# Altium PCB OpenRex_V1I1_PCB.PcbDoc (part 1 of 12)
Units mm, origin at the board's own origin, x right, y up, seen from the top; angles counter-clockwise.
Board outline 70 x 95 mm, 10 copper layers (L1, L2, L3, L4 (PWR), L5 (PWR), L6 (PWR), L7 (PWR), L8, L9, L10), stack 1.632 mm thick; 1080 components, 708 nets, 3831 pads, 2373 vias.
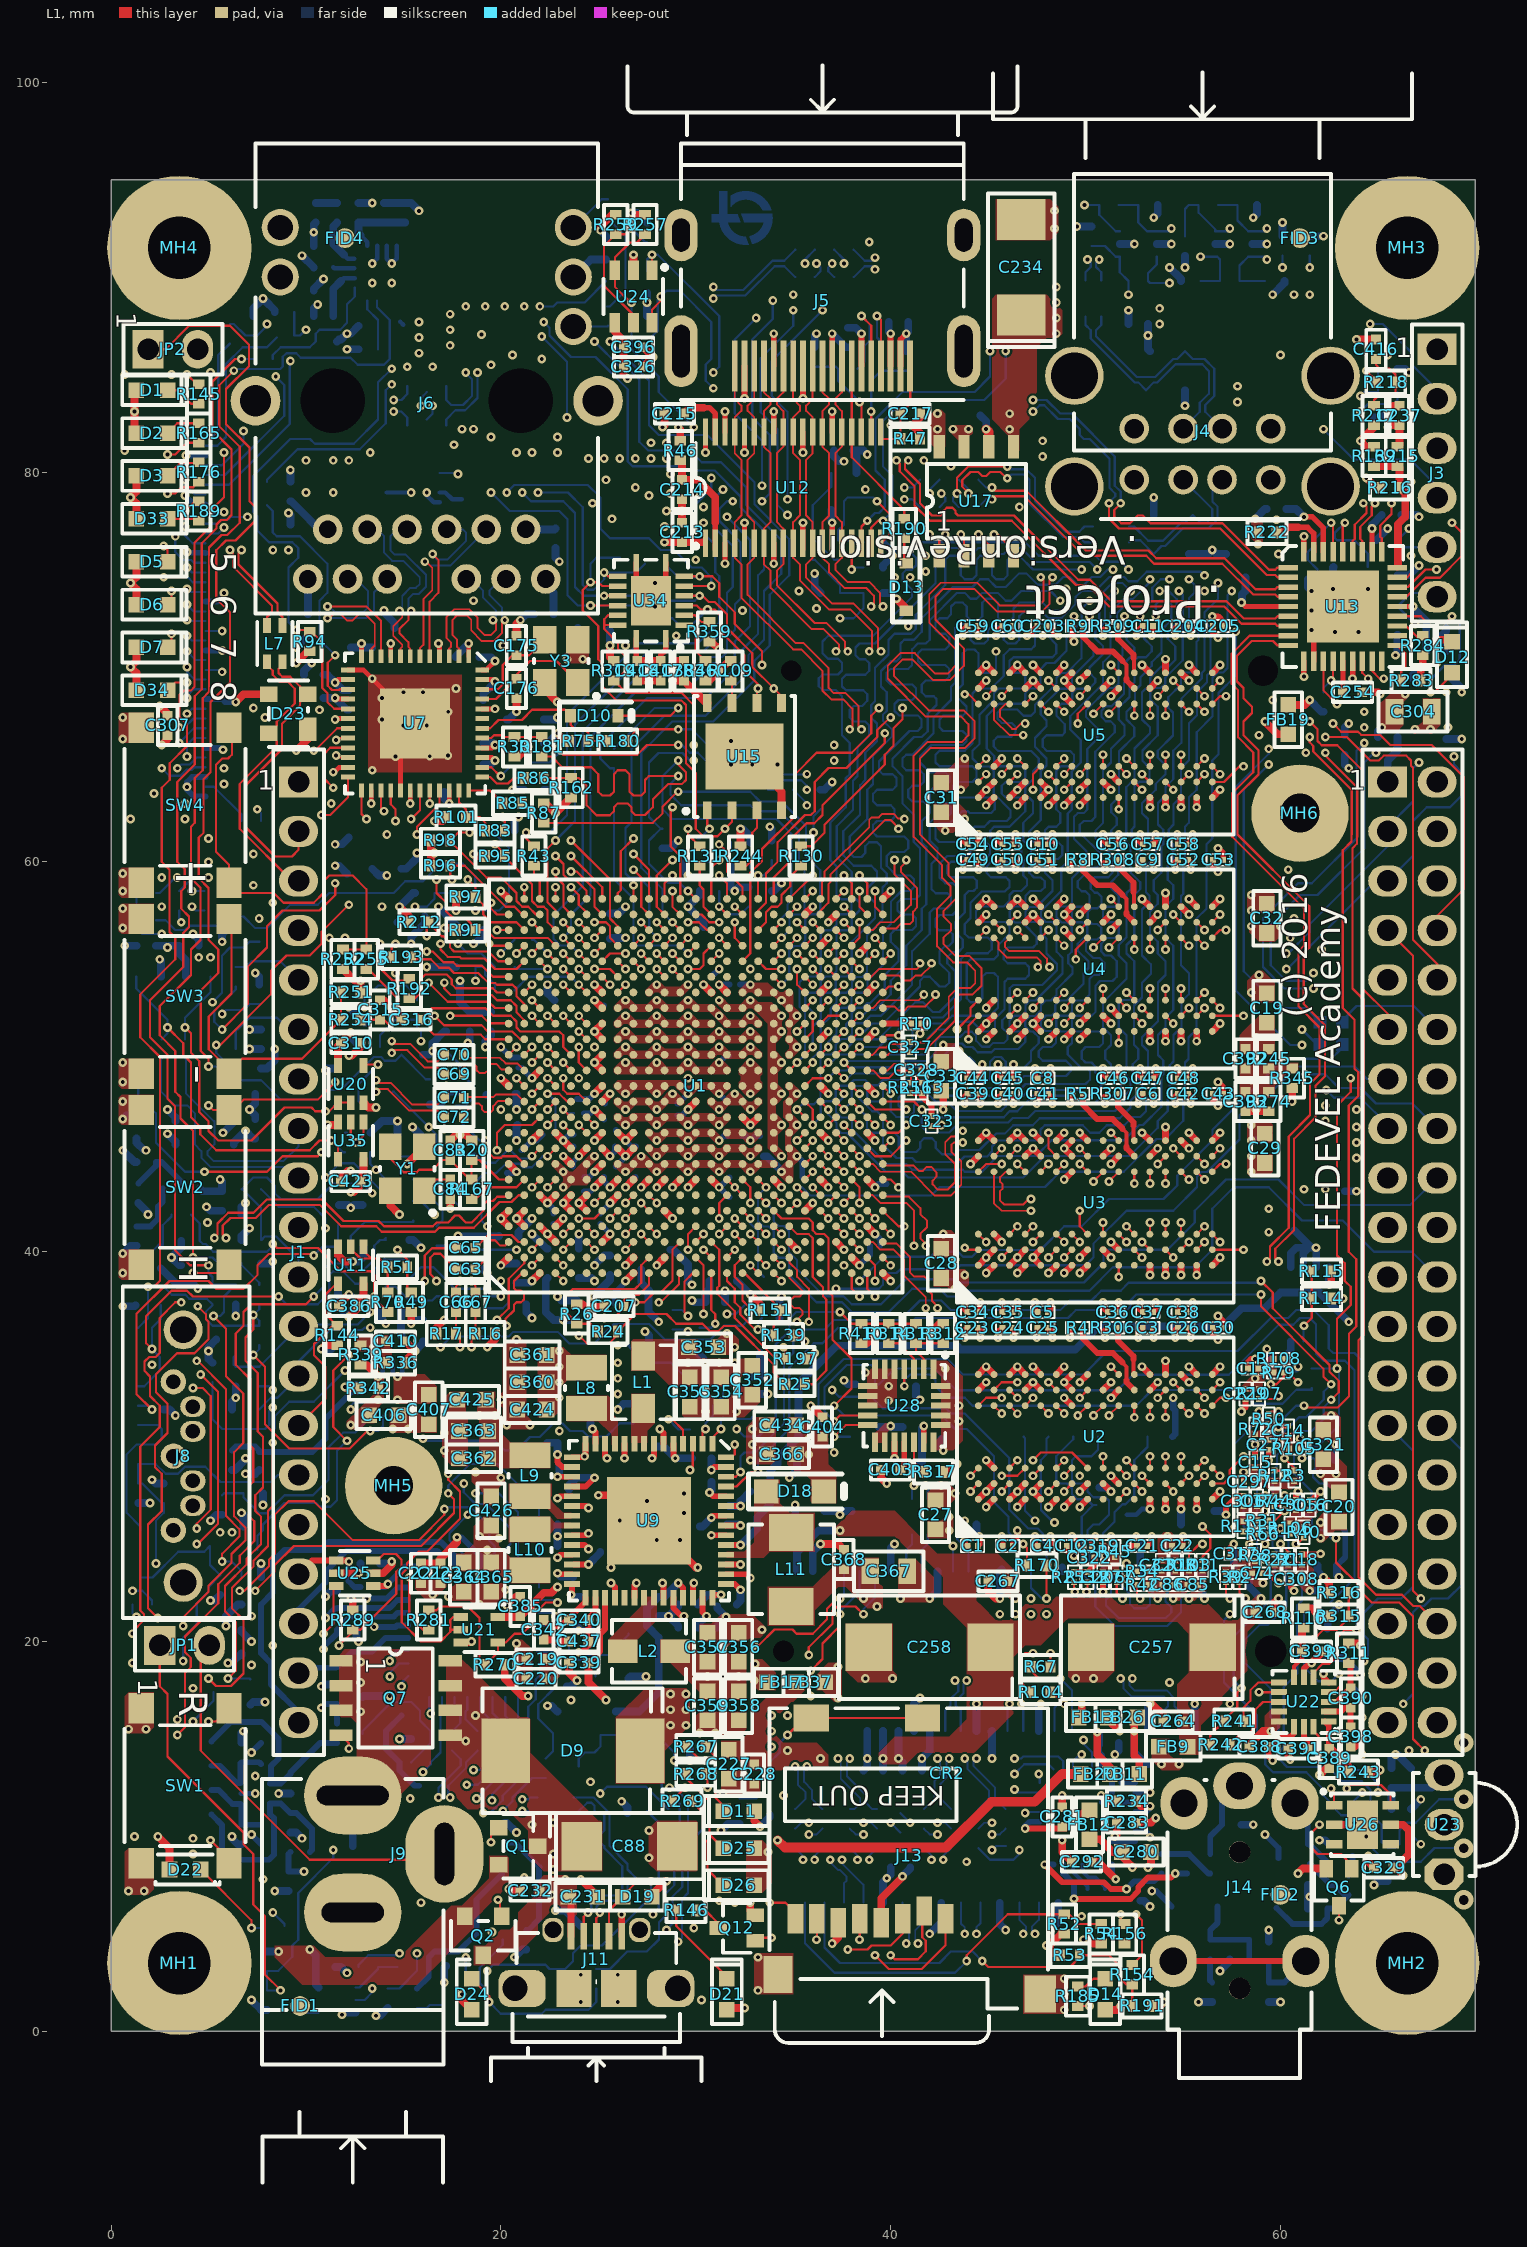
[diagram p0: L1 view]
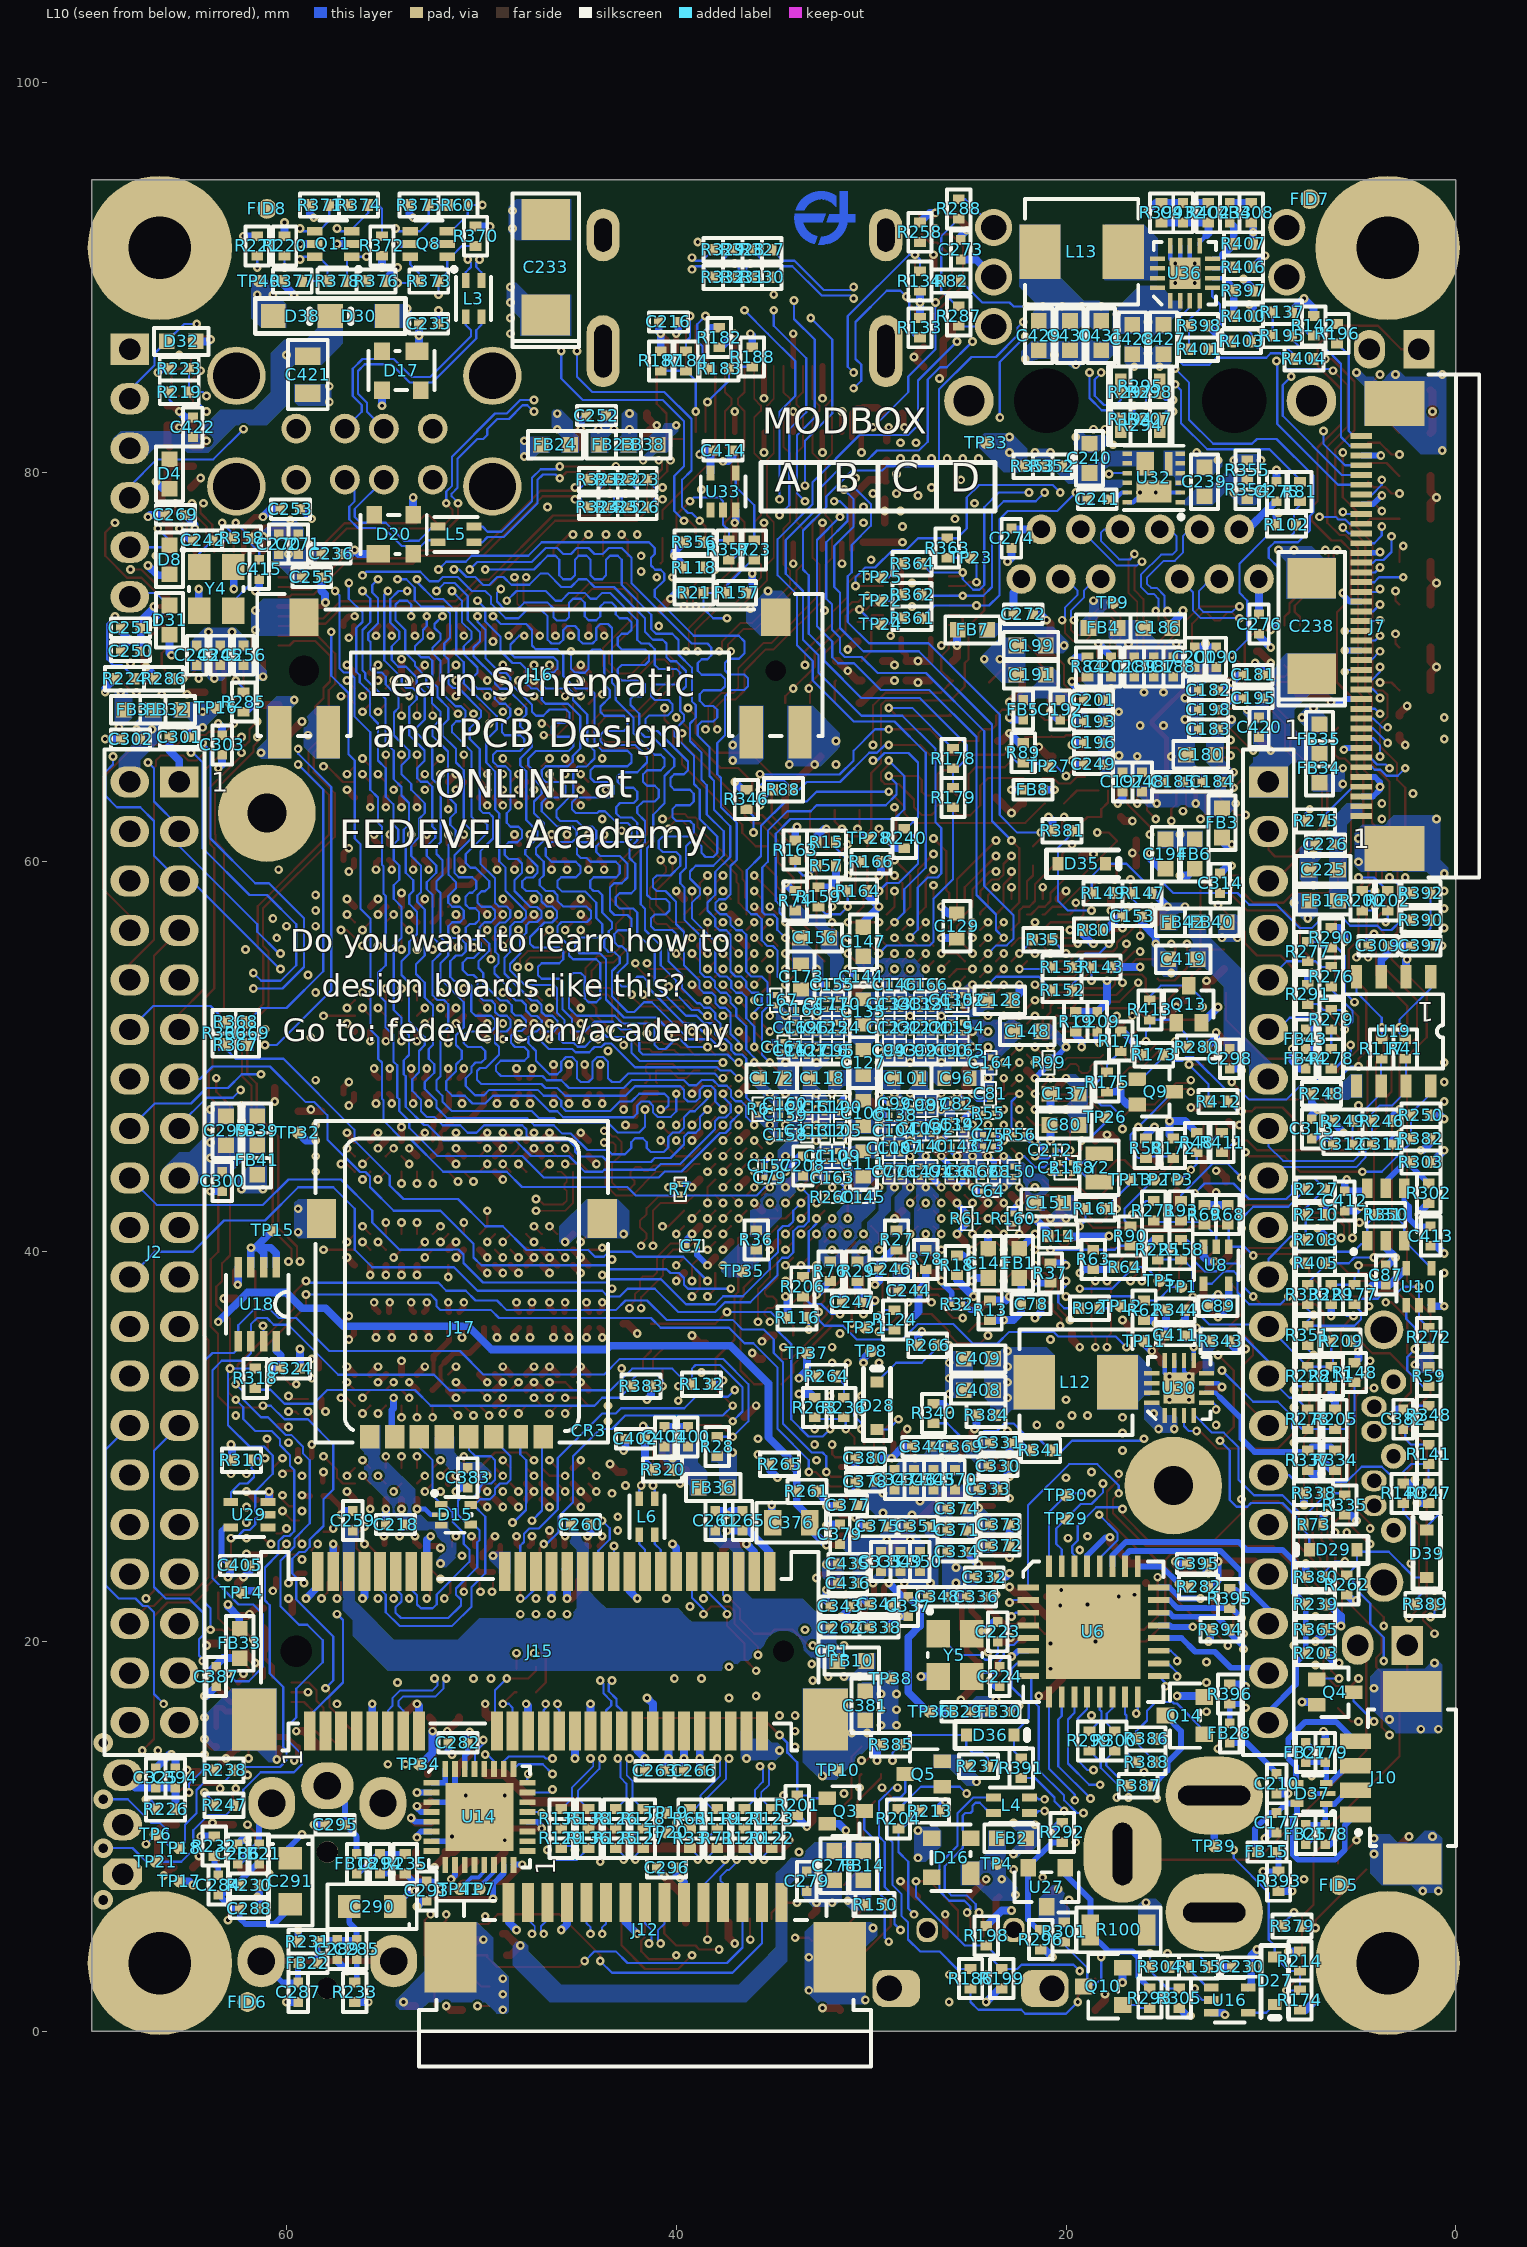
[diagram p1: L10 view, seen from below]
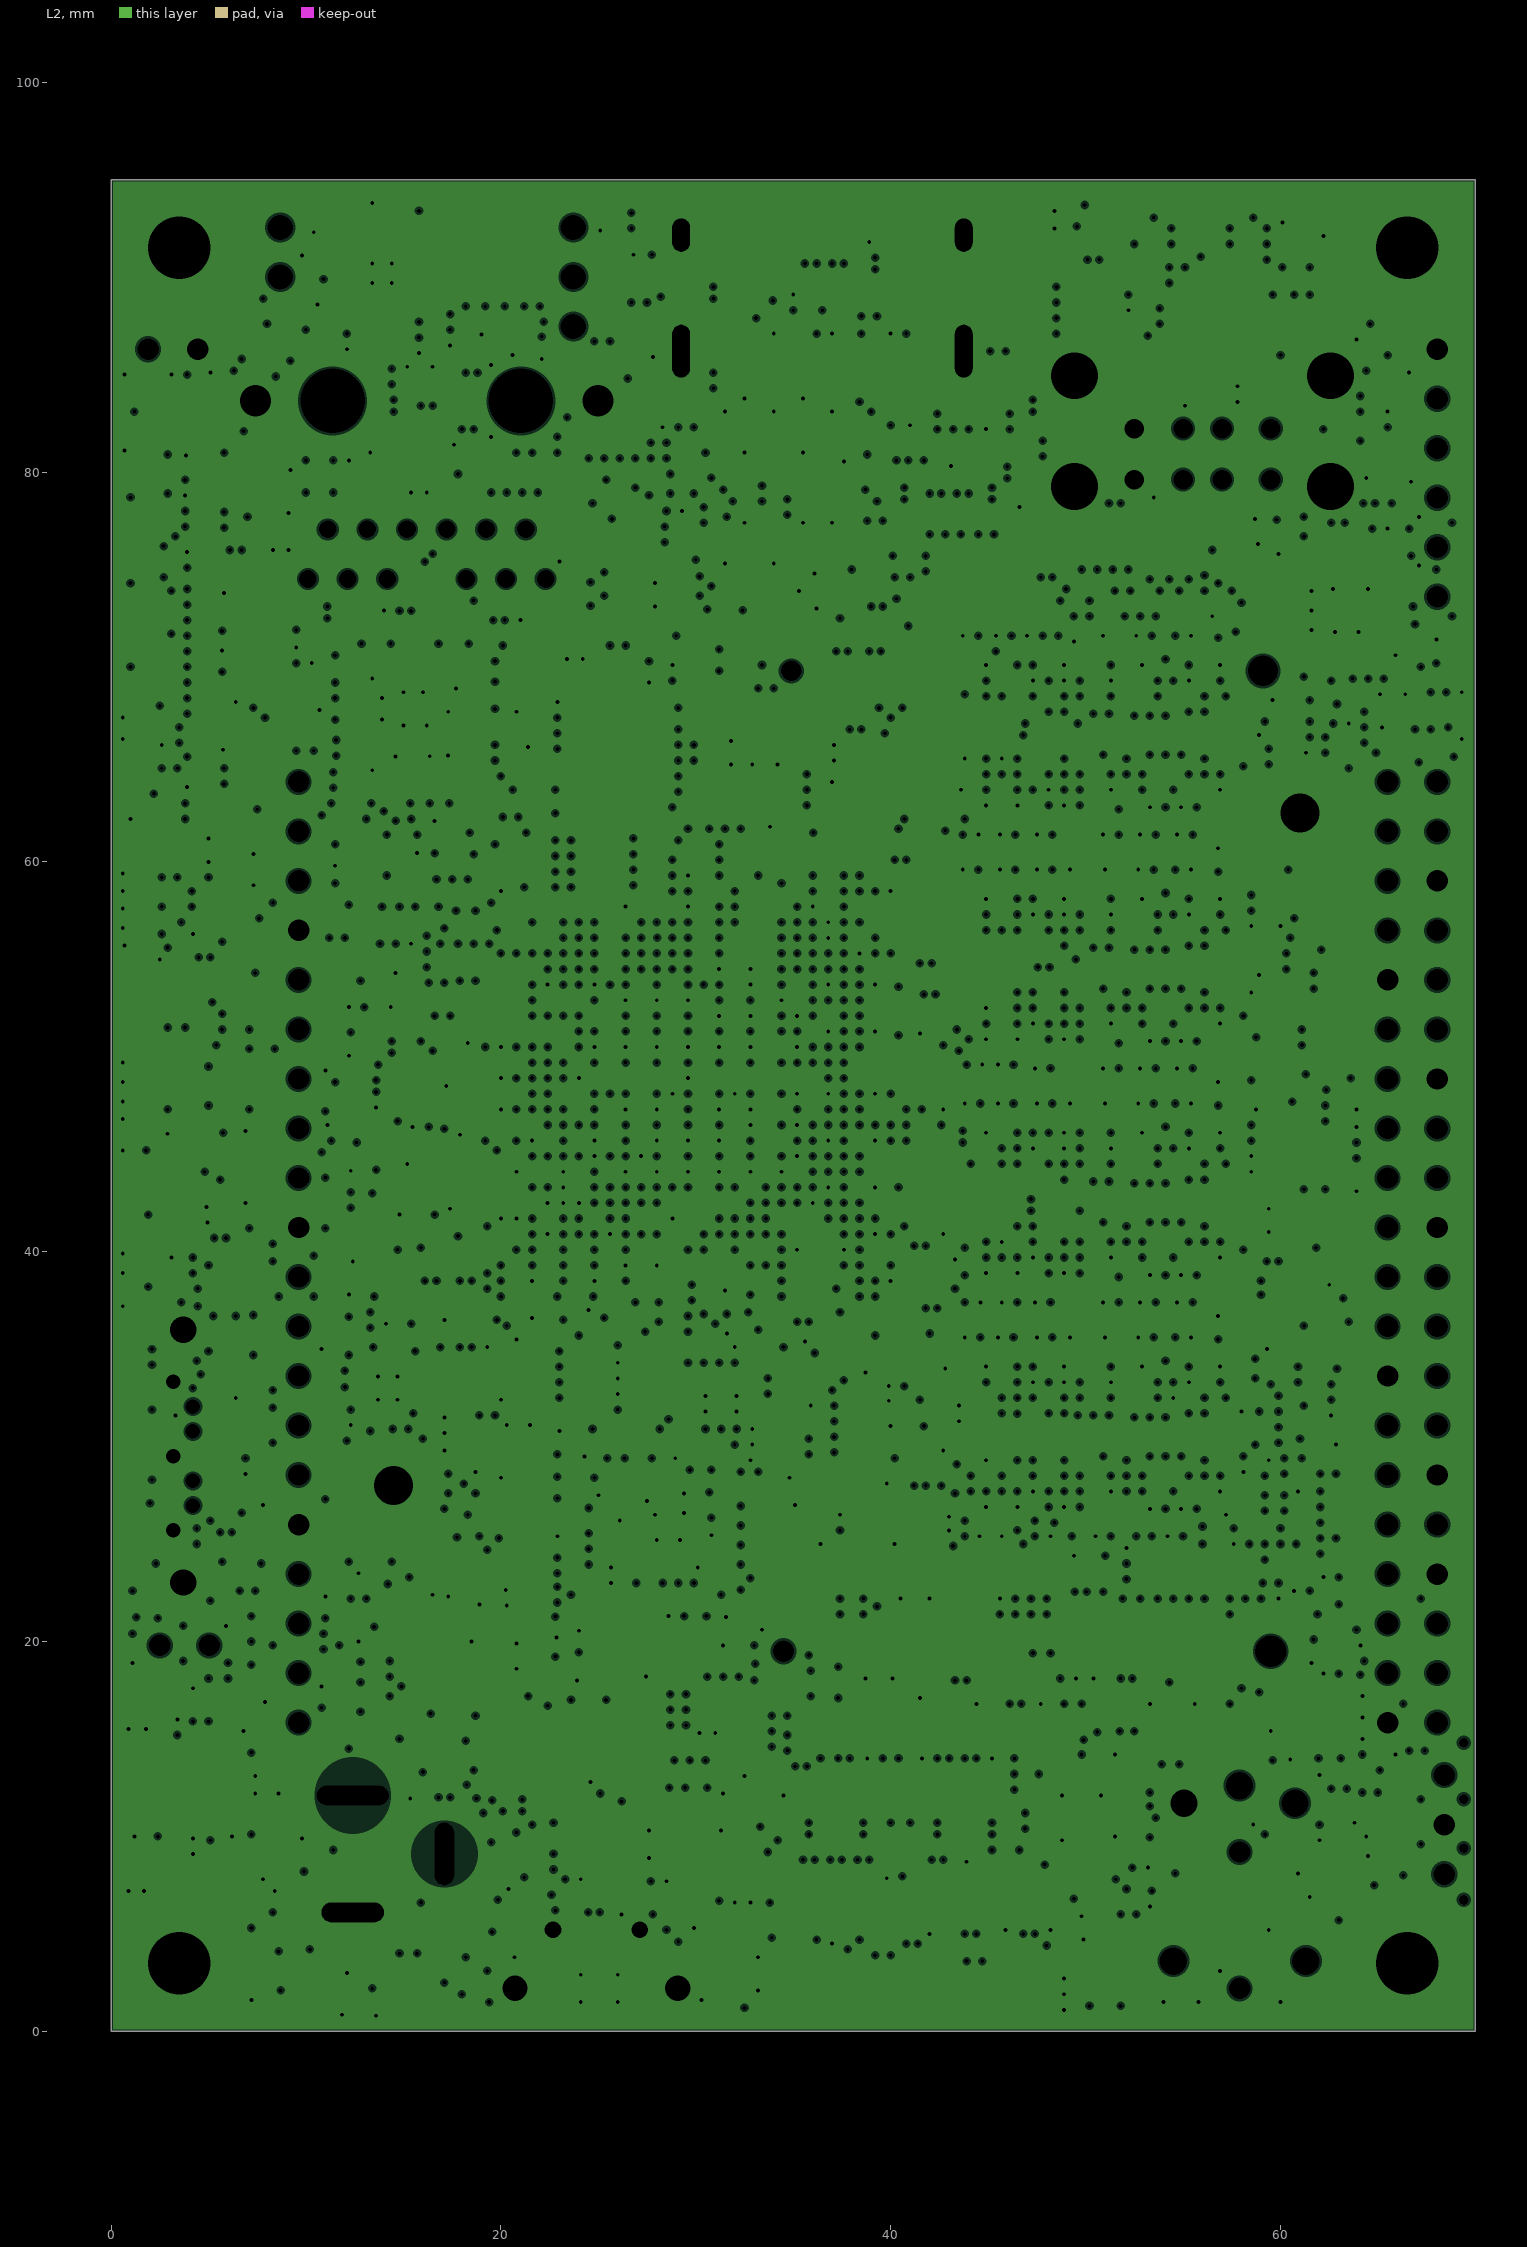
[diagram p2: L2, clearances drawn from the general rule]
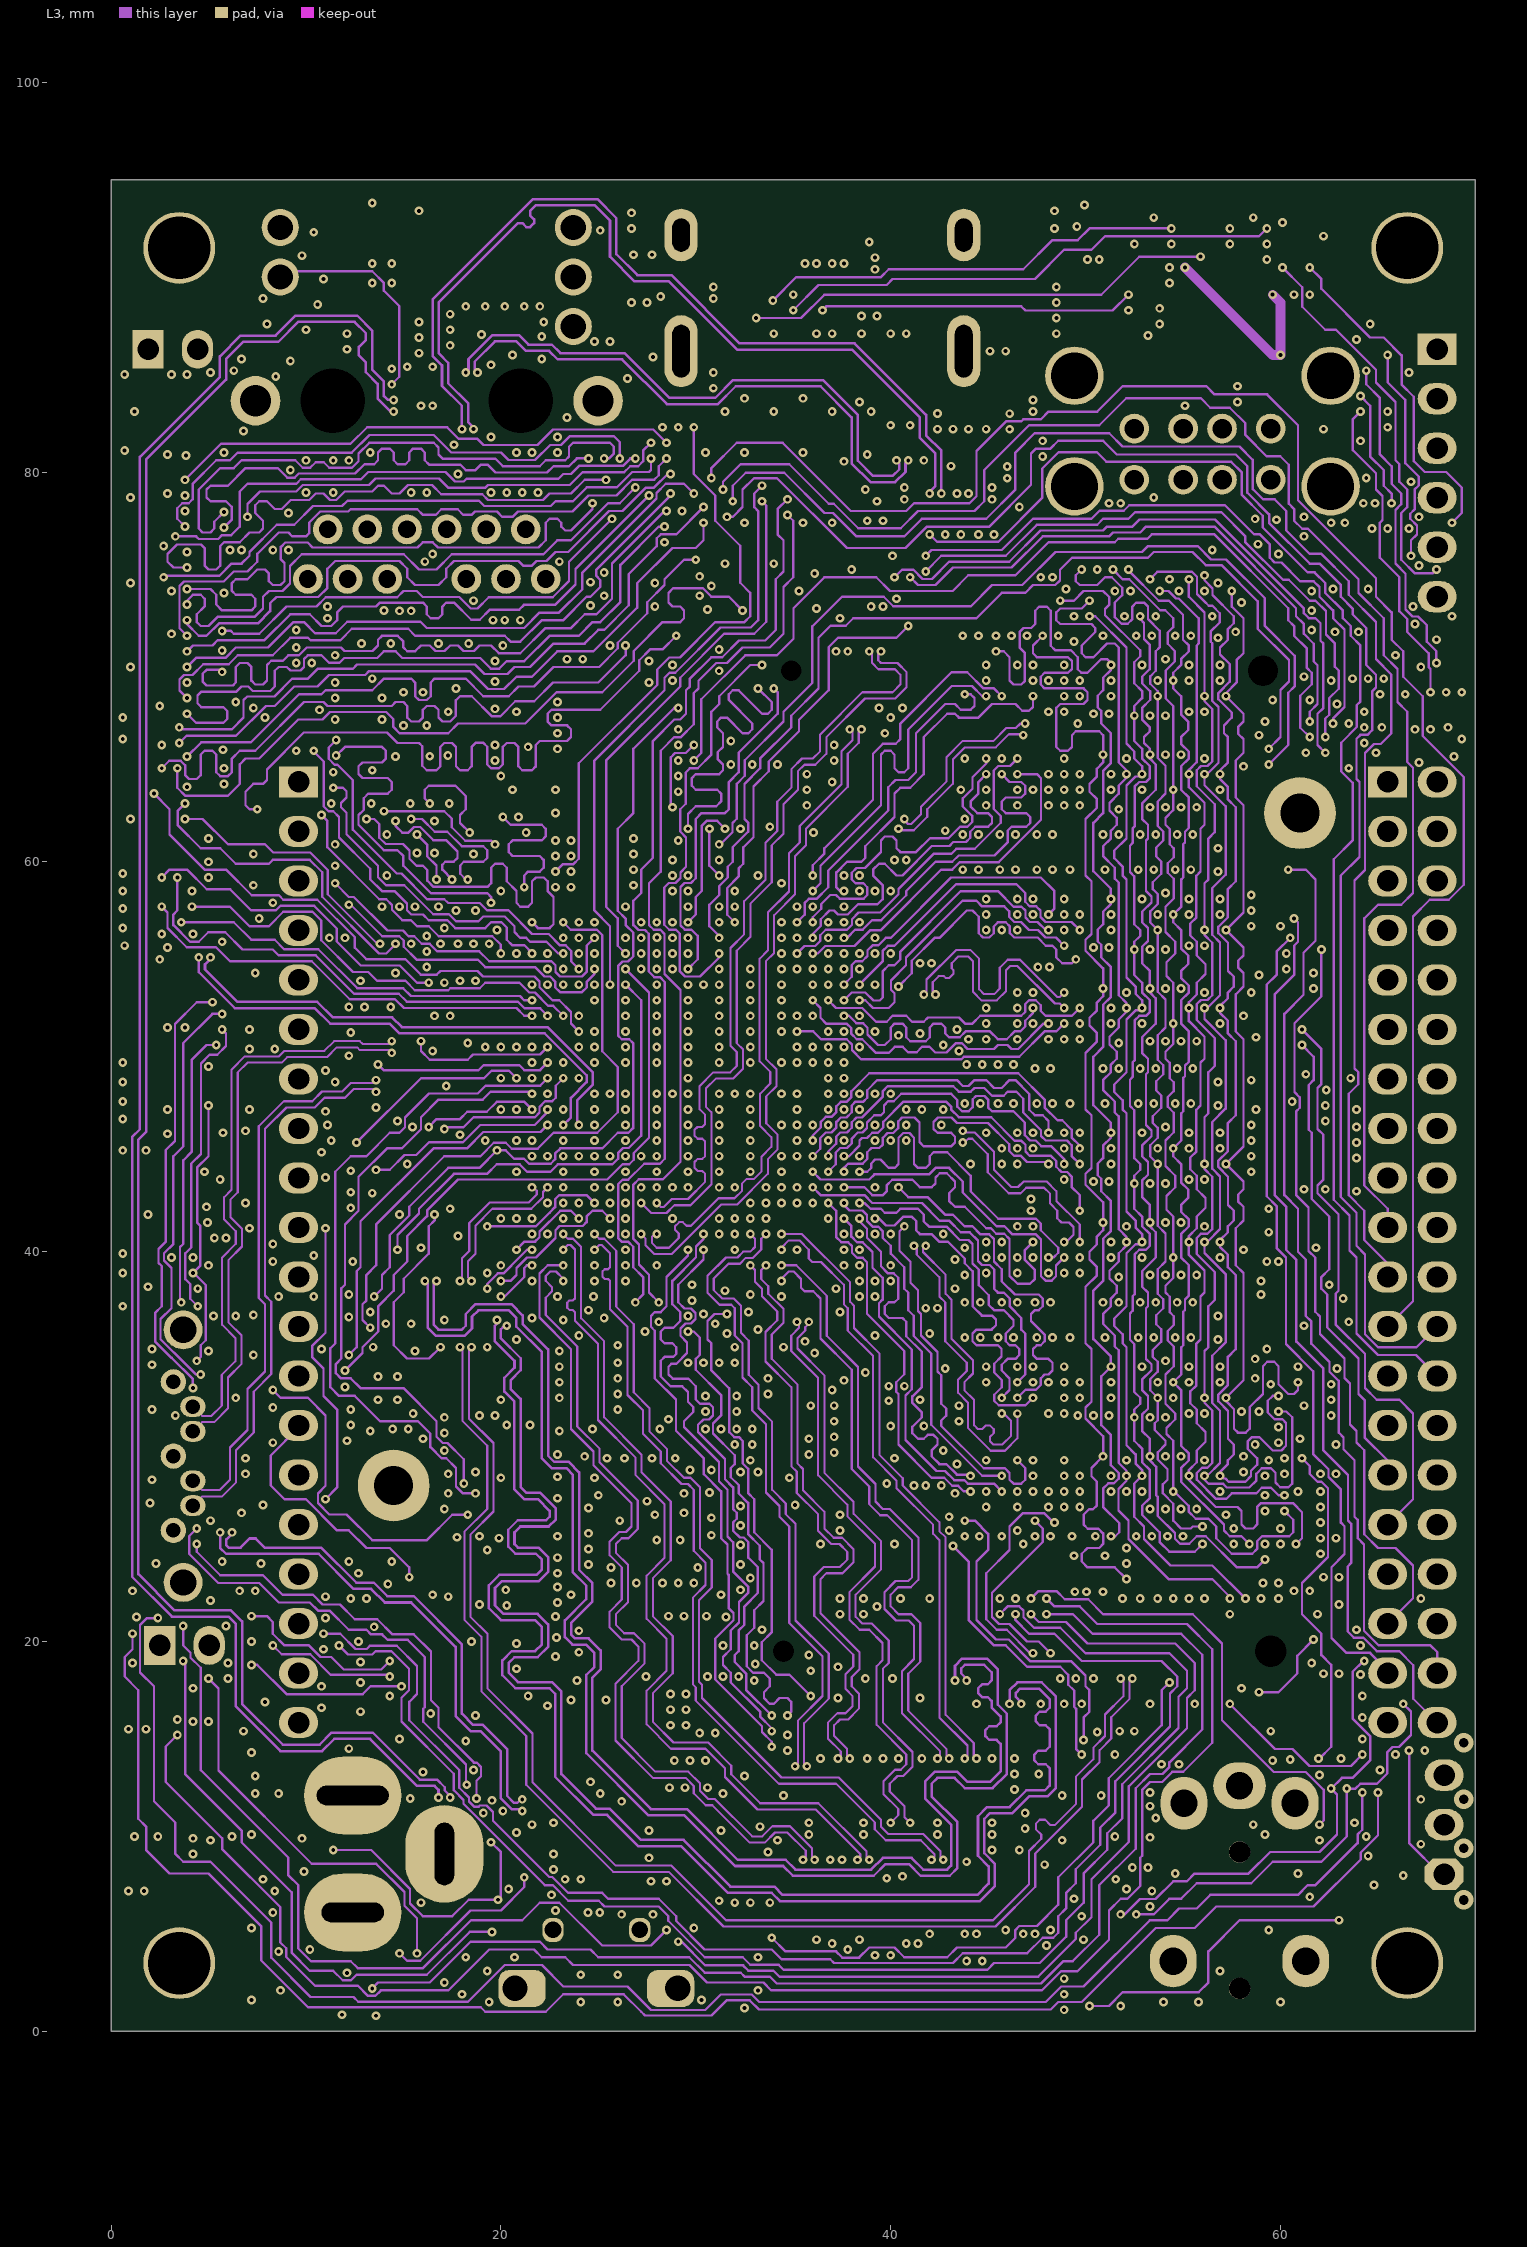
[diagram p3: L3]
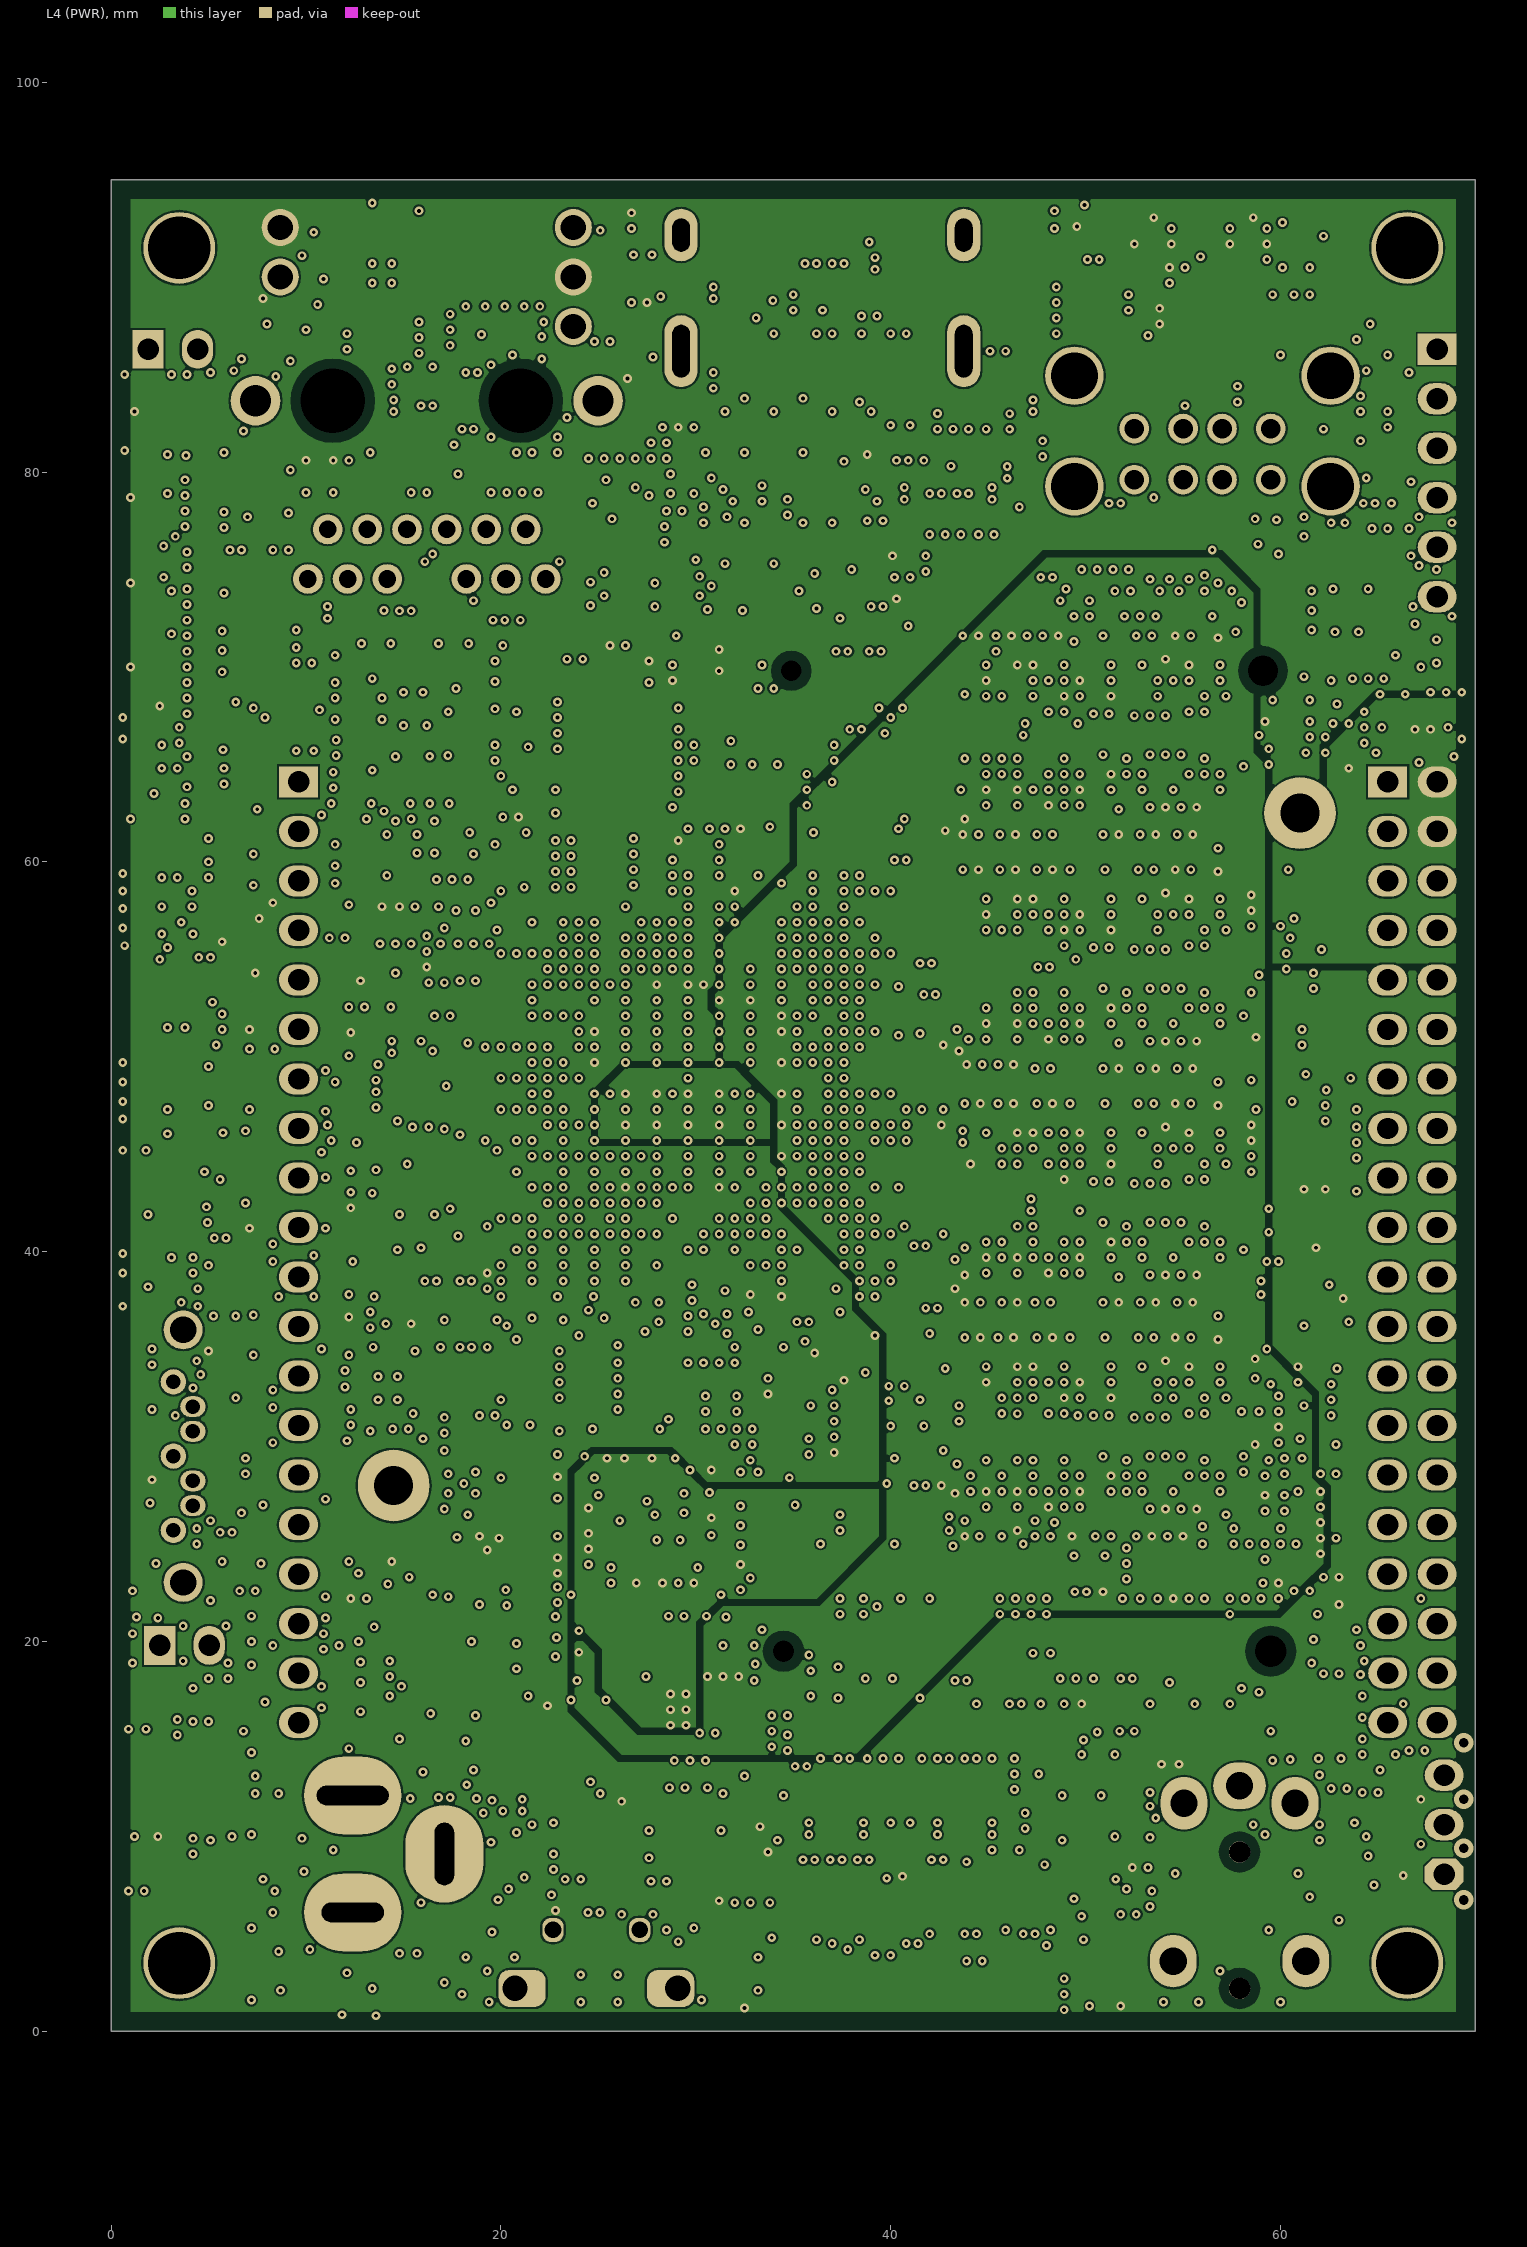
[diagram p4: L4 (PWR)]
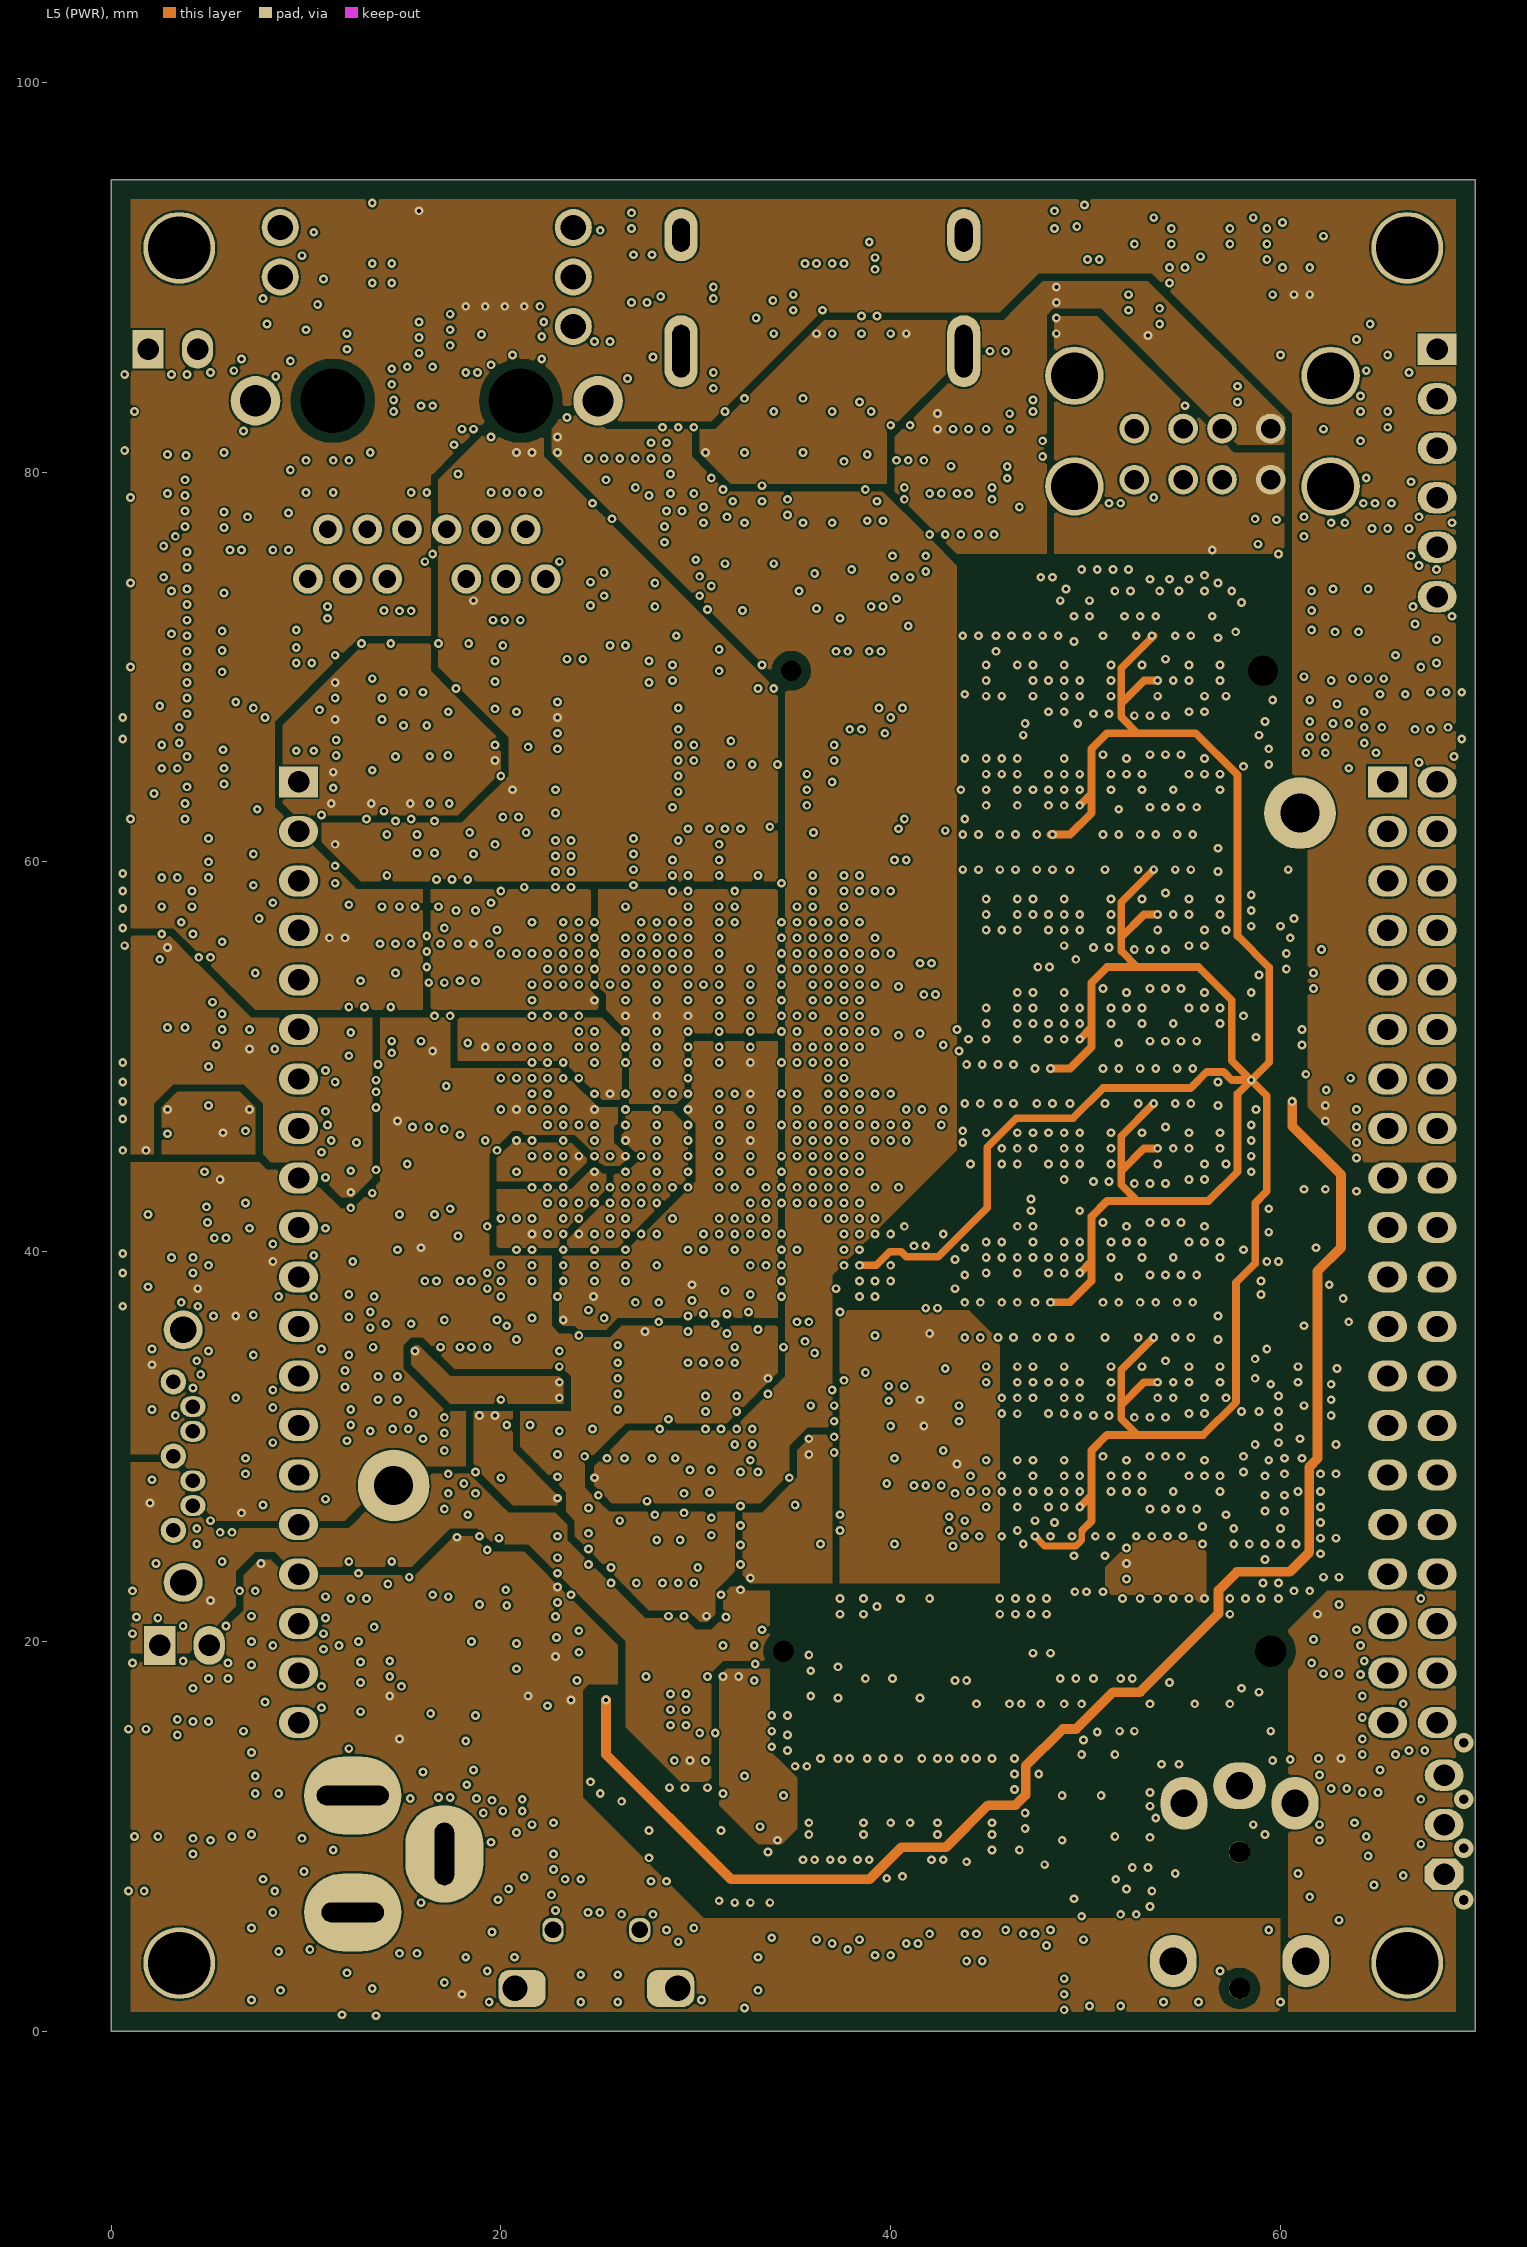
[diagram p5: L5 (PWR)]
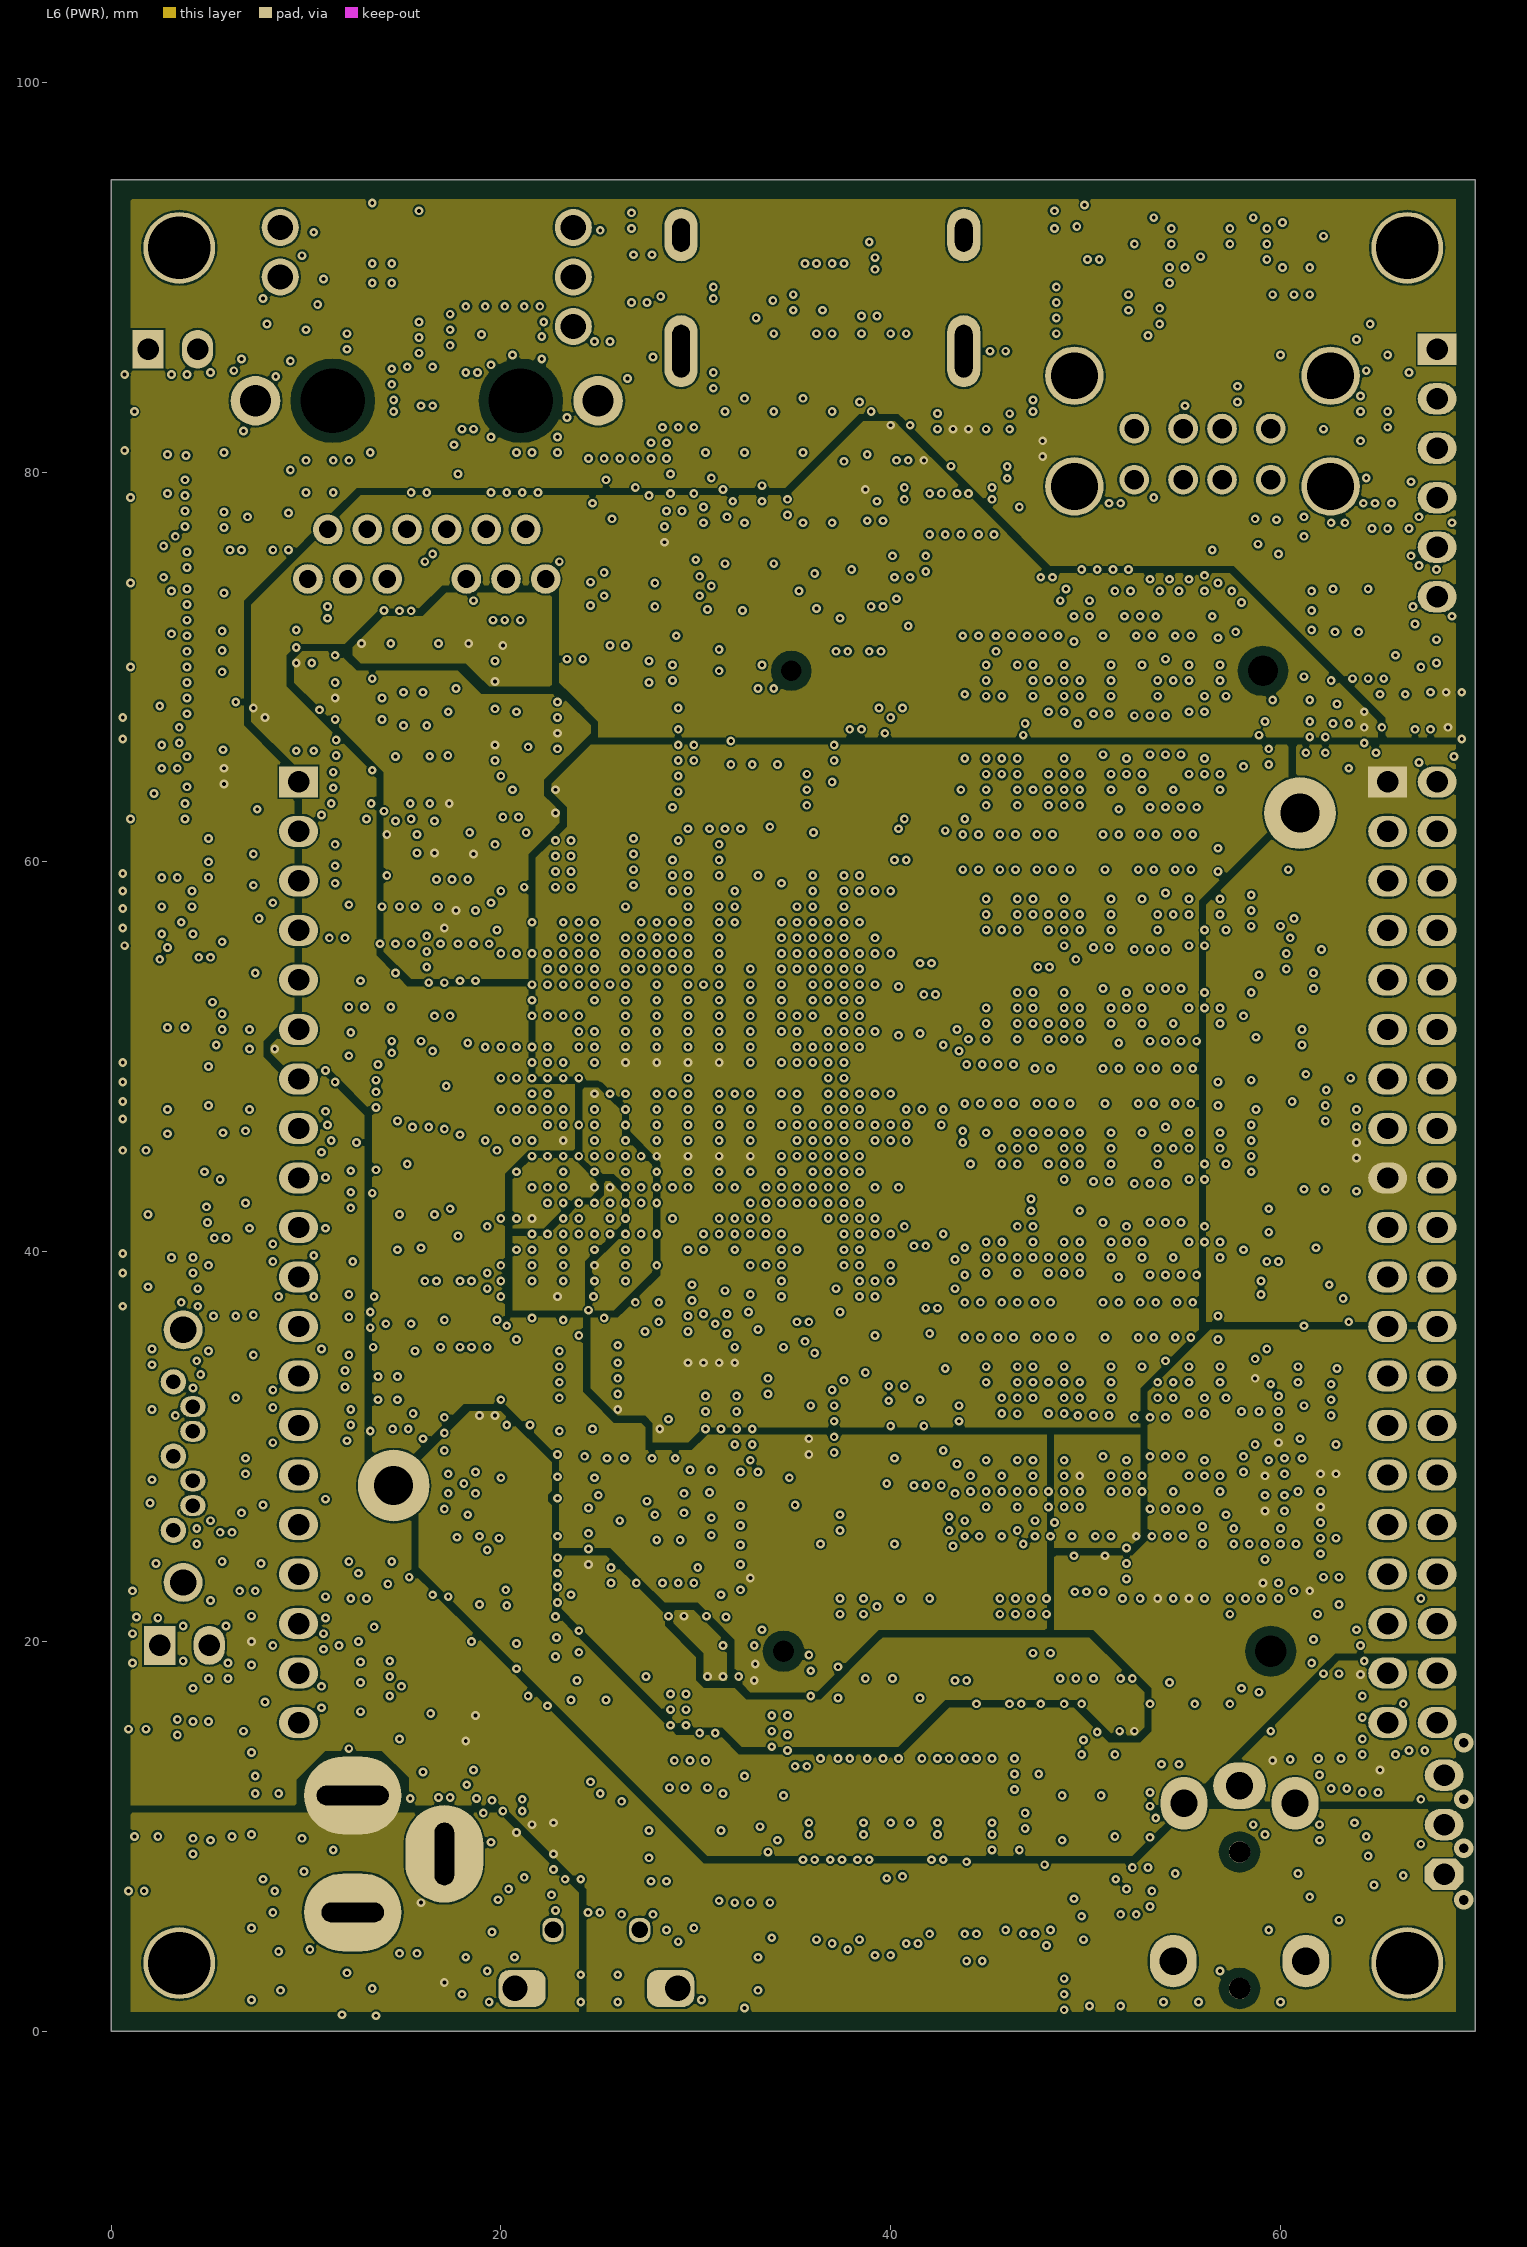
[diagram p6: L6 (PWR)]
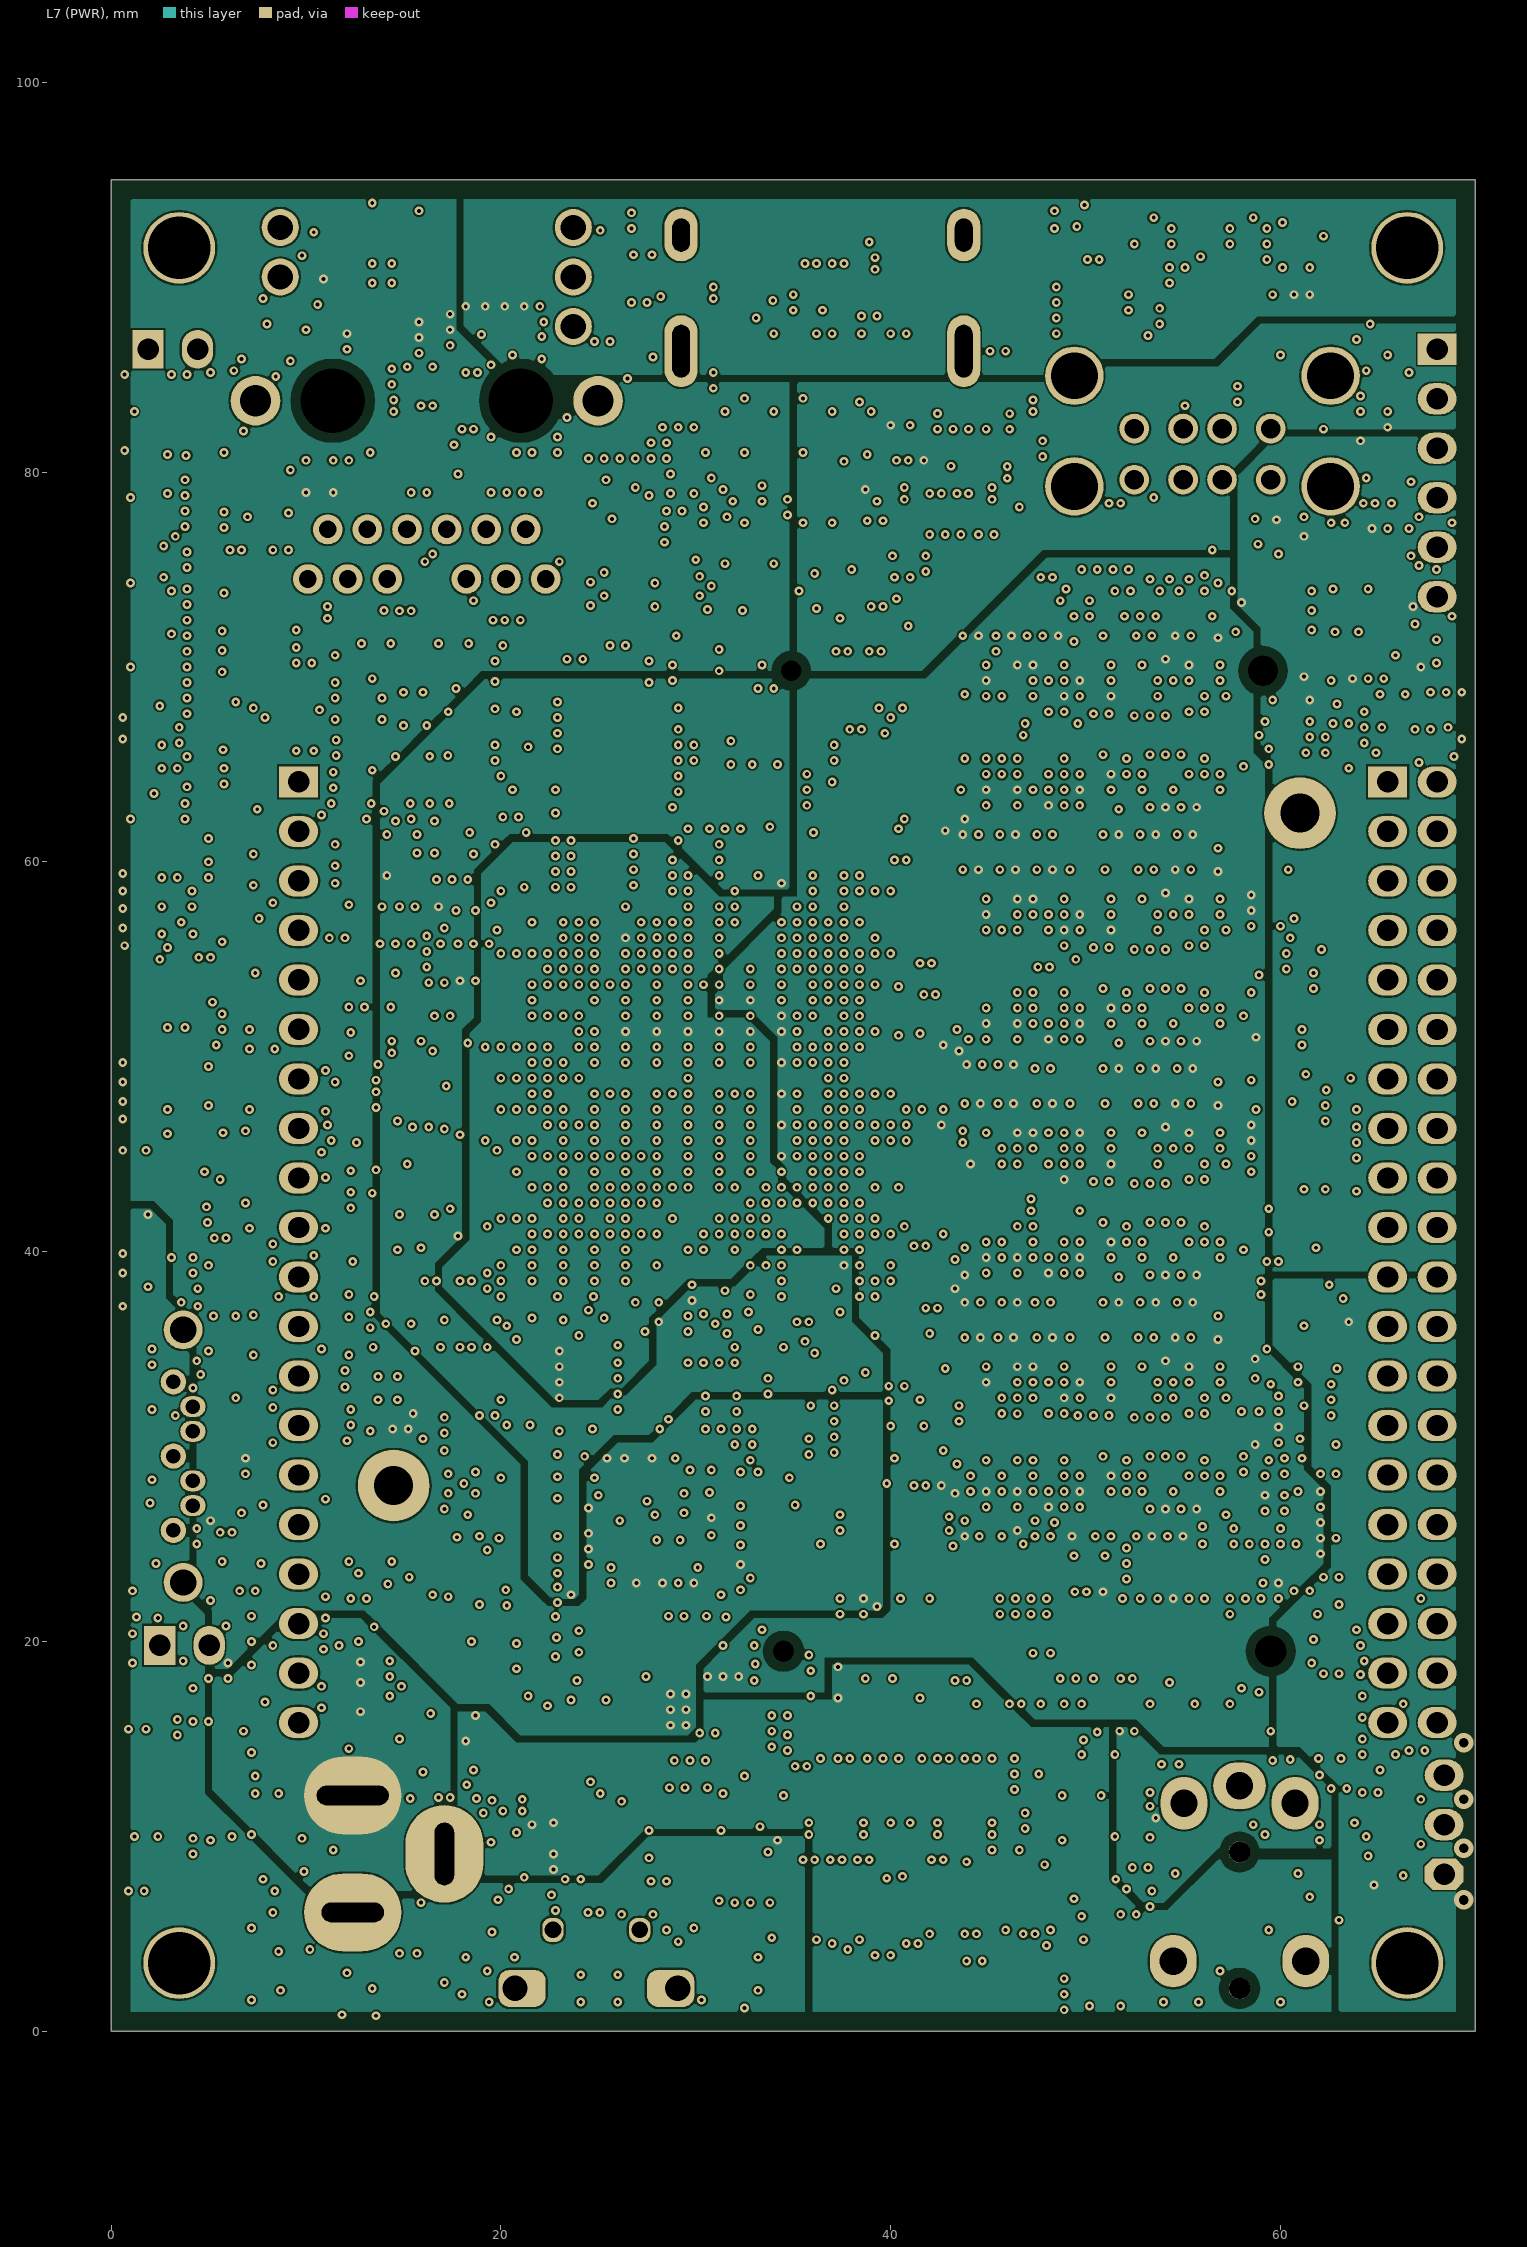
[diagram p7: L7 (PWR)]
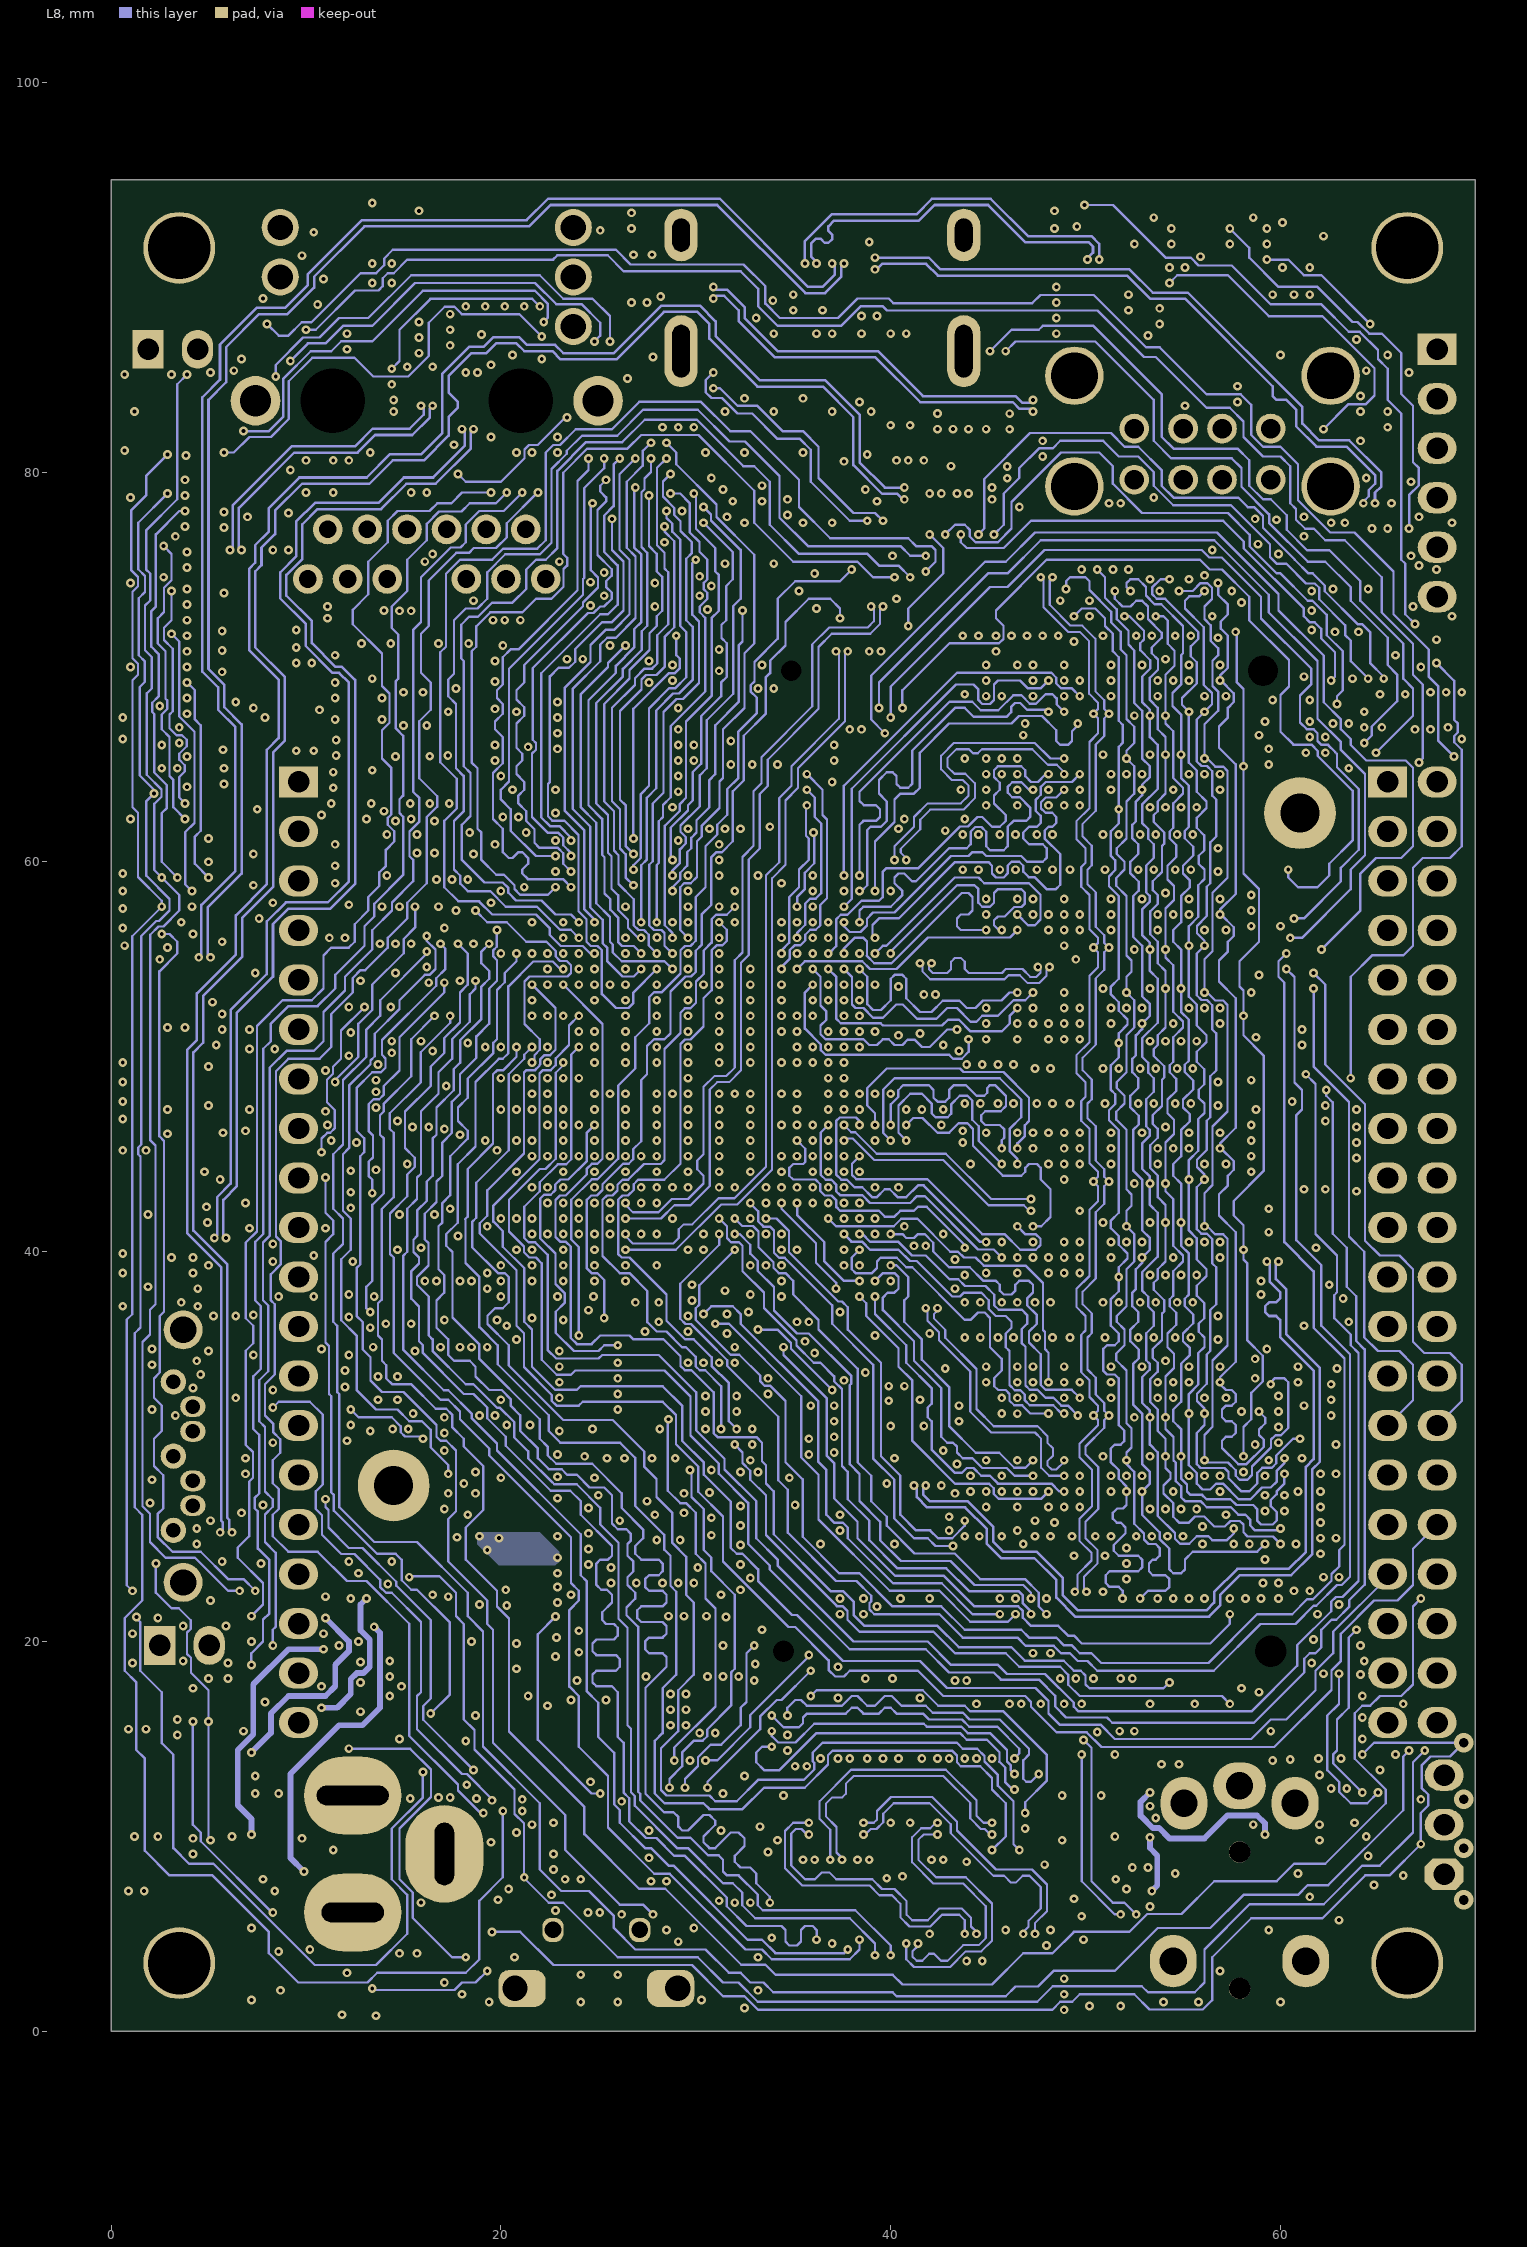
[diagram p8: L8]
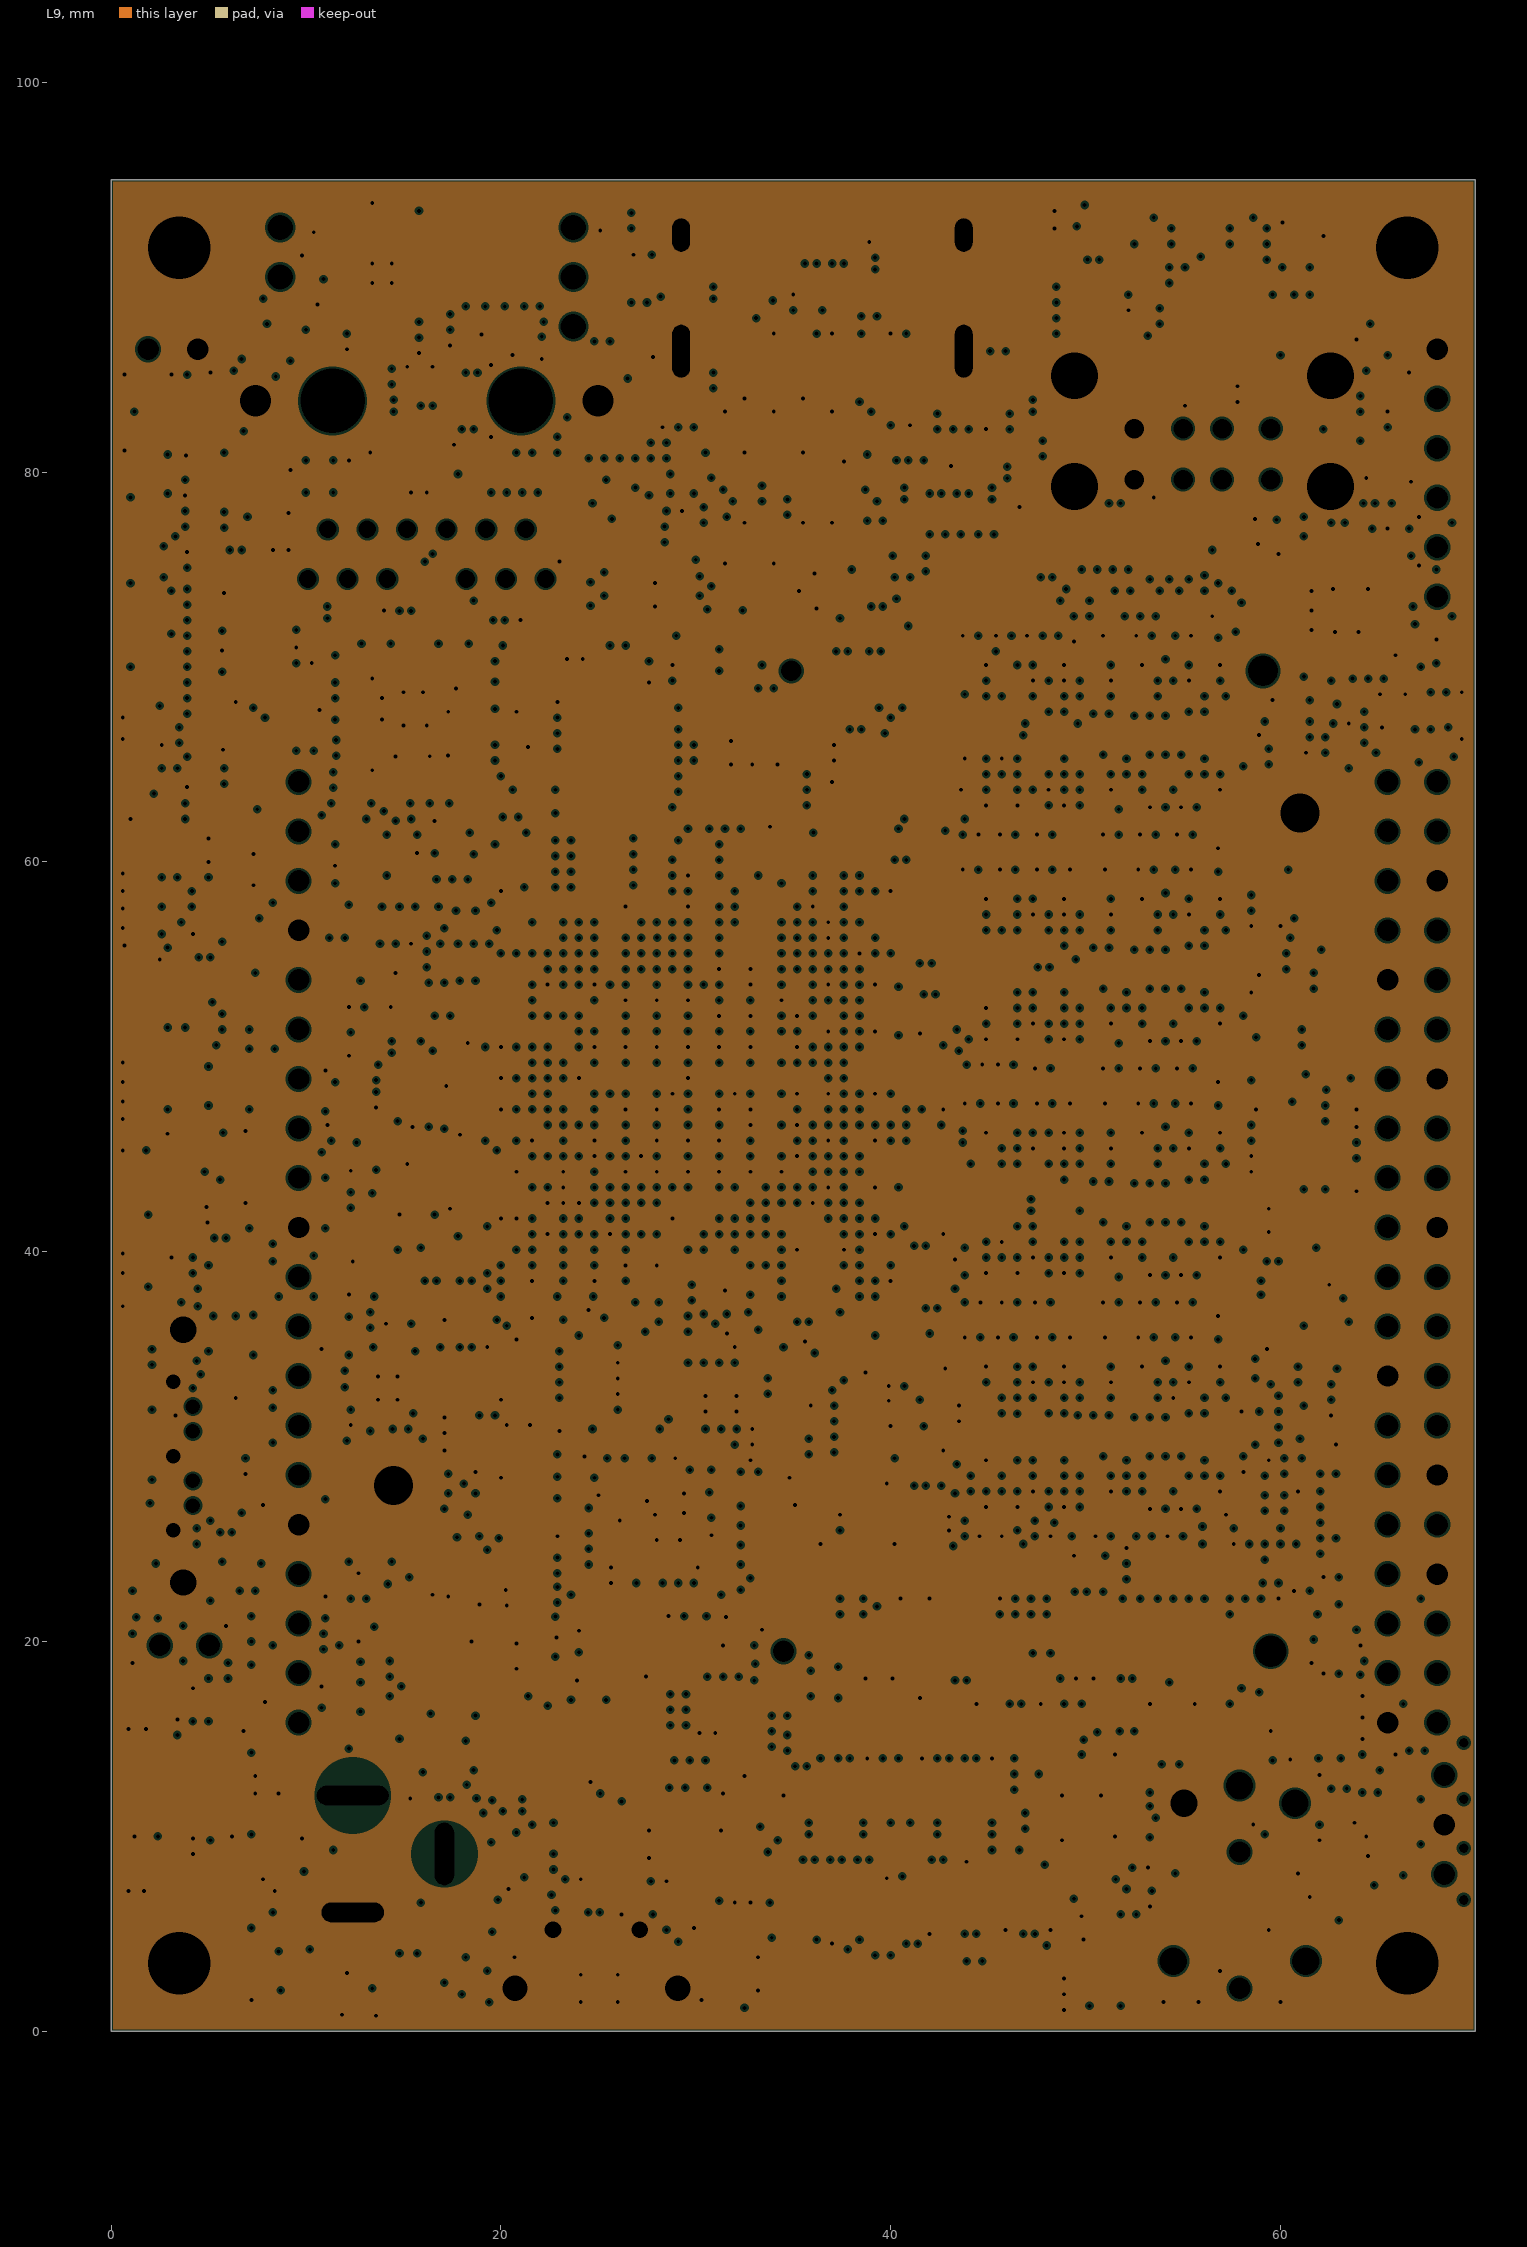
[diagram p9: L9, clearances drawn from the general rule]

## Layer stack, top to bottom
Top Solder: solder mask 0.02, Solder Resist, Dk 4.1
L1: signal copper 0.043
Dielectric1: core 0.074, VT47-1080, Dk 3.95
L2: plane copper 0.018, net GND
Dielectric2: prepreg 0.102, VT-47, Dk 4.12
L3: signal copper 0.018
Dielectric3: core 0.282, VT47-2113, Dk 4.06
L4 (PWR): signal copper 0.018
Dielectric4: prepreg 0.102, VT-47, Dk 4.12
L5 (PWR): signal copper 0.018
Dielectric 8: dielectric 0.282, VT47-2113, Dk 4.06
L6 (PWR): signal copper 0.018
Dielectric 9: dielectric 0.102, VT-47, Dk 4.12
L7 (PWR): signal copper 0.018
Dielectric5: core 0.282, VT47-2113, Dk 4.06
L8: signal copper 0.018
Dielectric6: prepreg 0.102, VT-47, Dk 4.12
L9: plane copper 0.018, net GND
Dielectric7: core 0.074, VT47-1080, Dk 3.95
L10: signal copper 0.043
Bottom Solder: solder mask 0.02, Solder Resist, Dk 4.1

## Board outline
0,0 70,0 70,95 0,95

## Design rules (kind name [scope] priority, off if disabled: settings)
Clearance "Pad Clearance" [IsPad vs IsPad] p1: gap=0.2
Clearance "Clearance Non Plated Holes" [InPadClass('NPTH')] p2: gap=0.5
Clearance "Signal tracks" [IsTrack and not(InNetClass('DIFF100') or InNetClass('DIFF90')) and (Width <= 0.3) vs IsTrack and (Width <= 0.3)] p3: gap=0.16
Clearance "Poly to Poly Inner Layers" [IsRegion AND (OnLayer('L4 (PWR)') OR OnLayer('L5 (PWR)') OR OnLayer('L6 (PWR)') OR OnLayer('L7 (PWR)')) vs IsRegion] p4: gap=0.35
Clearance "Poly to Poly Outer Layers" [IsRegion AND (OnLayer('L1') OR OnLayer('L10')) vs IsRegion or IsTrack] p5: gap=0.14
Clearance "PWR Poly to VIA" [IsRegion AND (OnLayer('L4 (PWR)') OR OnLayer('L5 (PWR)') OR OnLayer('L6 (PWR)') OR OnLayer('L7 (PWR)')) vs IsVia] p6: gap=0.1
Clearance [All] p7: gap=0.1
ComponentClearance "PCIe card model" [InComponent('CR1') vs InComponent('J15') or InComponent('J16')] p1: gap=0 collisioncheckmode=3 verticalgap=0 showdistances=FALSE
ComponentClearance "SIM Card model" [InComponent('CR1') or InComponent('CR3') vs InComponent('J17')] p2: gap=0 collisioncheckmode=3 verticalgap=0 showdistances=FALSE
ComponentClearance "SD Card model to SD slot" [InComponent('CR2') vs InComponent('J13')] p3: gap=0 collisioncheckmode=3 verticalgap=0 showdistances=FALSE
ComponentClearance "FID1 to J9" [InComponent('FID1') vs InComponent('J9')] p4: gap=0 collisioncheckmode=3 verticalgap=0 showdistances=FALSE
ComponentClearance "FID2 to J14" [InComponent('FID2') vs InComponent('J14')] p5: gap=0 collisioncheckmode=3 verticalgap=0 showdistances=FALSE
ComponentClearance "FID3 to J4" [InComponent('FID3') vs InComponent('J4')] p6: gap=0 collisioncheckmode=3 verticalgap=0 showdistances=FALSE
ComponentClearance "FID4 to J6" [InComponent('FID4') vs InComponent('J6')] p7: gap=0 collisioncheckmode=3 verticalgap=0 showdistances=FALSE
ComponentClearance USB0_N [InComponent('R322') vs InComponent('R321') or InComponent('R323')] p8: gap=0 collisioncheckmode=3 verticalgap=0 showdistances=FALSE
ComponentClearance USB0_P [InComponent('R325') vs InComponent('R324') or InComponent('R326')] p9: gap=0 collisioncheckmode=3 verticalgap=0 showdistances=FALSE
ComponentClearance USB1_N [InComponent('R328') vs InComponent('R327') or InComponent('R329')] p10: gap=0 collisioncheckmode=3 verticalgap=0 showdistances=FALSE
ComponentClearance USB1_P [InComponent('R331') vs InComponent('R330') or InComponent('R332')] p11: gap=0 collisioncheckmode=3 verticalgap=0 showdistances=FALSE
ComponentClearance "USB1_N R0805" [InComponent('R294') vs InComponent('R194') or InComponent('R207')] p12: gap=0 collisioncheckmode=3 verticalgap=0 showdistances=FALSE
ComponentClearance "USB1_P R0805" [InComponent('R295') vs InComponent('R297') or InComponent('R298')] p13: gap=0 collisioncheckmode=3 verticalgap=0 showdistances=FALSE
ComponentClearance "USB1_N R0402" [InComponent('R194') vs InComponent('R207')] p14: gap=0 collisioncheckmode=3 verticalgap=0 showdistances=FALSE
ComponentClearance "USB1_P R0402" [InComponent('R297') vs InComponent('R298')] p15: gap=0 collisioncheckmode=3 verticalgap=0 showdistances=FALSE
ComponentClearance CSI_D0_N [InComponent('R33') vs InComponent('R65')] p16: gap=0 collisioncheckmode=3 verticalgap=0 showdistances=FALSE
ComponentClearance CSI_D0_R [InComponent('R71') vs InComponent('R119')] p17: gap=0 collisioncheckmode=3 verticalgap=0 showdistances=FALSE
ComponentClearance CSI_D1_N [InComponent('R120') vs InComponent('R121')] p18: gap=0 collisioncheckmode=3 verticalgap=0 showdistances=FALSE
ComponentClearance CSI_D1_R [InComponent('R122') vs InComponent('R123')] p19: gap=0 collisioncheckmode=3 verticalgap=0 showdistances=FALSE
ComponentClearance CSI_D2_N [InComponent('R125') vs InComponent('R126')] p20: gap=0 collisioncheckmode=3 verticalgap=0 showdistances=FALSE
ComponentClearance CSI_D2_R [InComponent('R127') vs InComponent('R128')] p21: gap=0 collisioncheckmode=3 verticalgap=0 showdistances=FALSE
ComponentClearance LVDS0_CLK_N [InComponent('R129') vs InComponent('R135')] p22: gap=0 collisioncheckmode=3 verticalgap=0 showdistances=FALSE
ComponentClearance LVDS0_CLK_P [InComponent('R136') vs InComponent('R138')] p23: gap=0 collisioncheckmode=3 verticalgap=0 showdistances=FALSE
ComponentClearance CAN [InComponent('U19') vs InComponent('R41') or InComponent('R117')] p24: gap=0 collisioncheckmode=3 verticalgap=0 showdistances=FALSE
ComponentClearance "Reset circuit" [InComponent('U31') vs InComponent('R350')] p25: gap=0 collisioncheckmode=3 verticalgap=0 showdistances=FALSE
ComponentClearance "UART4_TXD PWM selection_1" [InComponent('R366') vs InComponent('R367') or InComponent('R368')] p26: gap=0 collisioncheckmode=3 verticalgap=0 showdistances=FALSE
ComponentClearance "UART4_TXD PWM selection_2" [InComponent('R369') vs InComponent('R367') or InComponent('R368')] p27: gap=0 collisioncheckmode=3 verticalgap=0 showdistances=FALSE
ComponentClearance "1V2_ETH source selection" [InComponent('R354') vs InComponent('R355')] p28: gap=0 collisioncheckmode=3 verticalgap=0 showdistances=FALSE
ComponentClearance "1V2_ETH output selection" [InComponent('R352') vs InComponent('R353')] p29: gap=0 collisioncheckmode=3 verticalgap=0 showdistances=FALSE
ComponentClearance "Beads MCU power" [InComponent('FB29') vs InComponent('FB30')] p30: gap=0 collisioncheckmode=3 verticalgap=0 showdistances=FALSE
ComponentClearance "Beads 5V MPCIe" [InComponent('FB17') vs InComponent('FB37')] p31: gap=0 collisioncheckmode=3 verticalgap=0 showdistances=FALSE
ComponentClearance "Beads 5V USB Bottom" [InComponent('FB38') vs InComponent('FB23')] p32: gap=0 collisioncheckmode=3 verticalgap=0 showdistances=FALSE
ComponentClearance "Beads Audio VDDD" [InComponent('FB20') vs InComponent('FB11')] p33: gap=0 collisioncheckmode=3 verticalgap=0 showdistances=FALSE
ComponentClearance "Beads Audio VDDA" [InComponent('FB26') vs InComponent('FB13')] p34: gap=0 collisioncheckmode=3 verticalgap=0 showdistances=FALSE
ComponentClearance "Beads CAN poer" [InComponent('FB43') vs InComponent('FB44')] p35: gap=0 collisioncheckmode=3 verticalgap=0 showdistances=FALSE
ComponentClearance "Header J1 5V selection" [InComponent('FB34') vs InComponent('FB35')] p36: gap=0 collisioncheckmode=3 verticalgap=0 showdistances=FALSE
ComponentClearance "Header J1 3V3 selection" [InComponent('FB40') vs InComponent('FB42')] p37: gap=0 collisioncheckmode=3 verticalgap=0 showdistances=FALSE
ComponentClearance "Header J2 5V selection" [InComponent('FB31') vs InComponent('FB32')] p38: gap=0 collisioncheckmode=3 verticalgap=0 showdistances=FALSE
ComponentClearance "Header J2 3V3 selection" [InComponent('FB39') vs InComponent('FB41')] p39: gap=0 collisioncheckmode=3 verticalgap=0 showdistances=FALSE
ComponentClearance "Diodes Serial console power" [InComponent('D30') vs InComponent('D38')] p40: gap=0 collisioncheckmode=3 verticalgap=0 showdistances=FALSE
ComponentClearance "MH2 and LED transistor" [InComponent('MH2') vs InComponent('Q6')] p41: gap=0 collisioncheckmode=3 verticalgap=0 showdistances=FALSE
ComponentClearance [All] p42: gap=0.2 collisioncheckmode=3 verticalgap=0.2 showdistances=FALSE
DiffPairsRouting DiffPair_DIFF100DiffPairsRouting [InDifferentialPairClass('DIFF100')] p1: maxlimit=0.25 minlimit=0.21 mostfreqgap=0.25 toplayer_mingap=0.22 toplayer_maxgap=0.22 toplayer_prefgap=0.22 toplayer_minwidth=0.1 toplayer_maxwidth=0.1 toplayer_prefwidth=0.1 midlayer1_maxgap=0.21 midlayer1_prefgap=0.21 midlayer1_minwidth=0.11 midlayer1_maxwidth=0.11 midlayer1_prefwidth=0.11 midlayer2_mingap=0.25 midlayer2_minwidth=0.2 midlayer2_maxwidth=0.2 midlayer2_prefwidth=0.2 midlayer3_mingap=0.25 midlayer3_minwidth=0.2 midlayer3_maxwidth=0.2 midlayer3_prefwidth=0.2 midlayer4_maxgap=0.21 midlayer4_prefgap=0.21 midlayer4_minwidth=0.11 midlayer4_maxwidth=0.11 midlayer4_prefwidth=0.11 midlayer5_mingap=0.25 midlayer5_minwidth=0.2 midlayer5_maxwidth=0.2 midlayer5_prefwidth=0.2 midlayer6_mingap=0.25 midlayer6_minwidth=0.2 midlayer6_maxwidth=0.2 midlayer6_prefwidth=0.2 bottomlayer_mingap=0.22 bottomlayer_maxgap=0.22 bottomlayer_prefgap=0.22 bottomlayer_minwidth=0.1 bottomlayer_maxwidth=0.1 bottomlayer_prefwidth=0.1 maxuncoupledlength=12.3
DiffPairsRouting DiffPair_DIFF90DiffPairsRouting [InDifferentialPairClass('DIFF90')] p2: maxlimit=0.2 minlimit=0.16 mostfreqgap=0.2 toplayer_maxgap=0.16 toplayer_prefgap=0.16 toplayer_minwidth=0.114 toplayer_maxwidth=0.114 toplayer_prefwidth=0.114 midlayer1_mingap=0.19 midlayer1_maxgap=0.19 midlayer1_prefgap=0.19 midlayer1_minwidth=0.13 midlayer1_maxwidth=0.13 midlayer1_prefwidth=0.13 midlayer2_mingap=0.2 midlayer2_minwidth=0.18 midlayer2_maxwidth=0.18 midlayer2_prefwidth=0.18 midlayer3_mingap=0.2 midlayer3_minwidth=0.18 midlayer3_maxwidth=0.18 midlayer3_prefwidth=0.18 midlayer4_mingap=0.19 midlayer4_maxgap=0.19 midlayer4_prefgap=0.19 midlayer4_minwidth=0.13 midlayer4_maxwidth=0.13 midlayer4_prefwidth=0.13 midlayer5_mingap=0.2 midlayer5_minwidth=0.18 midlayer5_maxwidth=0.18 midlayer5_prefwidth=0.18 midlayer6_mingap=0.2 midlayer6_minwidth=0.18 midlayer6_maxwidth=0.18 midlayer6_prefwidth=0.18 bottomlayer_maxgap=0.16 bottomlayer_prefgap=0.16 bottomlayer_minwidth=0.114 bottomlayer_maxwidth=0.114 bottomlayer_prefwidth=0.114 maxuncoupledlength=8.6
DiffPairsRouting [All] p3: maxlimit=0.2 minlimit=0.2 mostfreqgap=0.2 toplayer_minwidth=0.381 toplayer_maxwidth=0.381 toplayer_prefwidth=0.381 midlayer1_minwidth=0.381 midlayer1_maxwidth=0.381 midlayer1_prefwidth=0.381 midlayer2_minwidth=0.381 midlayer2_maxwidth=0.381 midlayer2_prefwidth=0.381 midlayer3_minwidth=0.381 midlayer3_maxwidth=0.381 midlayer3_prefwidth=0.381 midlayer4_minwidth=0.381 midlayer4_maxwidth=0.381 midlayer4_prefwidth=0.381 midlayer5_minwidth=0.381 midlayer5_maxwidth=0.381 midlayer5_prefwidth=0.381 midlayer6_minwidth=0.381 midlayer6_maxwidth=0.381 midlayer6_prefwidth=0.381 bottomlayer_minwidth=0.381 bottomlayer_maxwidth=0.381 bottomlayer_prefwidth=0.381 maxuncoupledlength=0
Height [All] p1: minheight=-8 maxheight=25.4 prefheight=12.7
HoleSize [All] p1: absolutevalues=TRUE maxlimit=10 minlimit=0.2 maxpercent=80.000 minpercent=20.000
HoleToHoleClearance [All] p1: gap=0.3 allowstackedmicrovias=TRUE
MatchedLengths MatchedLengths_Bank0 [InNetClass('DRAM_BANK0')] p1: tolerance=0.254 checknetsindiffpair=FALSE checkdiffpairvsdiffpair=FALSE checkothers=TRUE
MatchedLengths MatchedLengths_Bank1 [InNetClass('DRAM_BANK1')] p2: tolerance=0.254 checknetsindiffpair=FALSE checkdiffpairvsdiffpair=FALSE checkothers=TRUE
MatchedLengths MatchedLengths_Bank2 [InNetClass('DRAM_BANK2')] p3: tolerance=0.254 checknetsindiffpair=FALSE checkdiffpairvsdiffpair=FALSE checkothers=TRUE
MatchedLengths MatchedLengths_Bank3 [InNetClass('DRAM_BANK3')] p4: tolerance=0.254 checknetsindiffpair=FALSE checkdiffpairvsdiffpair=FALSE checkothers=TRUE
MatchedLengths MatchedLengths_Bank4 [InNetClass('DRAM_BANK4')] p5: tolerance=0.254 checknetsindiffpair=FALSE checkdiffpairvsdiffpair=FALSE checkothers=TRUE
MatchedLengths MatchedLengths_Bank5 [InNetClass('DRAM_BANK5')] p6: tolerance=0.254 checknetsindiffpair=FALSE checkdiffpairvsdiffpair=FALSE checkothers=TRUE
MatchedLengths MatchedLengths_Bank6 [InNetClass('DRAM_BANK6')] p7: tolerance=0.254 checknetsindiffpair=FALSE checkdiffpairvsdiffpair=FALSE checkothers=TRUE
MatchedLengths MatchedLengths_Bank7 [InNetClass('DRAM_BANK7')] p8: tolerance=0.254 checknetsindiffpair=FALSE checkdiffpairvsdiffpair=FALSE checkothers=TRUE
MatchedLengths DiffPair_DIFF100MatchedLengths [InDifferentialPairClass('DIFF100')] p9: tolerance=0.127 checknetsindiffpair=TRUE checkdiffpairvsdiffpair=FALSE checkothers=FALSE
MatchedLengths DiffPair_DIFF90MatchedLengths [InDifferentialPairClass('DIFF90')] p10: tolerance=0.127 checknetsindiffpair=TRUE checkdiffpairvsdiffpair=FALSE checkothers=FALSE
MinimumSolderMaskSliver [All] p1: minsoldermaskwidth=0.1
PlaneClearance [All] p1: clearance=0.12
PlaneConnect "GND to J9" [Incomponent('J9')] p1: planeconnectstyle=Relief reliefexpansion=0.5 reliefentries=4 reliefconductorwidth=2 reliefairgap=0.3
PlaneConnect "GND to MH" [Incomponent('MH1') or Incomponent('MH2') or Incomponent('MH3') or Incomponent('MH4') or Incomponent('MH5') or Incomponent('MH6')] p2: planeconnectstyle=Direct reliefexpansion=0.508 reliefentries=4 reliefconductorwidth=0.254 reliefairgap=0.254
PlaneConnect "GND to PAD" [(InNet('GND') and IsPad)] p3: planeconnectstyle=Relief reliefexpansion=0.3 reliefentries=4 reliefconductorwidth=0.5 reliefairgap=0.2
PlaneConnect [All] p4: planeconnectstyle=Direct reliefexpansion=0.2 reliefentries=4 reliefconductorwidth=0.3 reliefairgap=0.2
PolygonConnect [All] p1: connectstyle=Direct reliefconductorwidth=0.254 reliefentries=4 polygonreliefangle="90 Angle" airgapwidth=0.254
RoutingVias [All] p1: holewidth=0.2 width=0.45 viastyle="Through Hole" minholewidth=0.2 minwidth=0.45 maxholewidth=0.5 maxwidth=1
SilkToSilkClearance [All] p1: silktosilkclearance=0.1
SilkToSolderMaskClearance SilkscreenOverComponentPads [IsPad] p1: minsilkscreentomaskgap=0.1 clearancetoexposedcopper=TRUE
SolderMaskExpansion [All] p1: expansion=0.102
UnpouredPolygon [All] p1: allowunpoured=FALSE
Width DiffPair_DIFF100Width [InDifferentialPairClass('DIFF100')] p1: maxlimit=0.2 minlimit=0.1 preferedwidth=0.2 toplayer_maxwidth=0.1 toplayer_prefwidth=0.1 midlayer1_minwidth=0.11 midlayer1_maxwidth=0.11 midlayer1_prefwidth=0.11 midlayer2_minwidth=0.2 midlayer3_minwidth=0.2 midlayer4_minwidth=0.11 midlayer4_maxwidth=0.11 midlayer4_prefwidth=0.11 midlayer5_minwidth=0.2 midlayer6_minwidth=0.2 bottomlayer_maxwidth=0.1 bottomlayer_prefwidth=0.1 minimp=50.000000 maximp=50.000000 favimp=50.000000
Width DiffPair_DIFF90Width [InDifferentialPairClass('DIFF90')] p2: maxlimit=0.2 minlimit=0.114 preferedwidth=0.2 toplayer_maxwidth=0.114 toplayer_prefwidth=0.114 midlayer1_minwidth=0.13 midlayer1_maxwidth=0.13 midlayer1_prefwidth=0.13 midlayer2_minwidth=0.2 midlayer3_minwidth=0.2 midlayer4_minwidth=0.13 midlayer4_maxwidth=0.13 midlayer4_prefwidth=0.13 midlayer5_minwidth=0.2 midlayer6_minwidth=0.2 bottomlayer_maxwidth=0.114 bottomlayer_prefwidth=0.114 minimp=50.000000 maximp=50.000000 favimp=50.000000
Width "Width Power" [InNet('+VIN') OR InNet('+5V') OR InNet('+3V3') OR InNet('+1V5_DDR') OR InNet('+1V375_CORE') OR InNet('+1V375_SOC') OR InNet('+2V5')] p3: maxlimit=4 minlimit=0.2 preferedwidth=0.4
Width "Width Ground" [InNet('GND')] p4: maxlimit=40 minlimit=0.23 preferedwidth=0.4
Width [All] p5: maxlimit=2 minlimit=0.114 preferedwidth=0.15 toplayer_prefwidth=0.12 midlayer1_minwidth=0.12 midlayer1_prefwidth=0.12 midlayer2_minwidth=0.15 midlayer3_minwidth=0.15 midlayer4_minwidth=0.12 midlayer4_prefwidth=0.12 midlayer5_minwidth=0.15 midlayer6_minwidth=0.15 bottomlayer_prefwidth=0.12 minimp=50.000000 maximp=50.000000 favimp=50.000000
19 further rules are at their usual default settings.

## Classes and differential pairs
net class VID_IN_CSI1: I2C3_CSI1_SCL I2C3_CSI1_SDA VID_IN_CSI1_D0 VID_IN_CSI1_D1 VID_IN_CSI1_D2 VID_IN_CSI1_D3 VID_IN_CSI1_D4 VID_IN_CSI1_D5 VID_IN_CSI1_D6 VID_IN_CSI1_D7 VID_IN_CSI1_D8 VID_IN_CSI1_D9 VID_IN_CSI1_D10 VID_IN_CSI1_D11 VID_IN_CSI1_D12 VID_IN_CSI1_D13 VID_IN_CSI1_D14 VID_IN_CSI1_D15 VID_IN_CSI1_D16 VID_IN_CSI1_D17 VID_IN_CSI1_D18 VID_IN_CSI1_D19 VID_IN_CSI1_DE VID_IN_CSI1_HSYNC VID_IN_CSI1_INT VID_IN_CSI1_INT2 VID_IN_CSI1_PIXCLK VID_IN_CSI1_PIXCLK_R VID_IN_CSI1_RSTN_R VID_IN_CSI1_VSYNC
net class SD2: SD2_ACT SD2_CD SD2_CLK SD2_CLK_R SD2_CMD SD2_CMD_R SD2_DATA0 SD2_DATA1 SD2_DATA2 SD2_DATA3 SD2_WP
net class UART5: UART5_RXD UART5_TXD
net class UART4: UART4_RXD UART4_TXD
net class UART3: UART3_CTS UART3_RTS UART3_RXD UART3_TXD
net class UART2: UART2_RXD UART2_TXD
net class I2C3: I2C3_SCL I2C3_SDA
net class I2C2: I2C2_SCL I2C2_SDA
net class I2C1: I2C1_SCL I2C1_SDA
net class CSPI3: CSPI3_CLK CSPI3_CLK_R CSPI3_CS0 CSPI3_CS2 CSPI3_MCU_CLK CSPI3_MCU_CS0 CSPI3_MCU_ENN CSPI3_MCU_MISO CSPI3_MCU_MOSI CSPI3_MISO CSPI3_MOSI
net class CSPI2: CSPI2_CLK CSPI2_CLK_R CSPI2_CS0 CSPI2_MISO CSPI2_MOSI
net class CSPI1: CSPI1_CLK CSPI1_CLK_R CSPI1_CS0 CSPI1_CS1 CSPI1_MISO CSPI1_MOSI
net class AUD3: AUD3_CLK AUD3_CLK_R AUD3_RXD AUD3_TXC AUD3_TXC_R AUD3_TXD AUD3_TXFS
net class TS: TS_X+ TS_X- TS_Y+ TS_Y-
net class "CSI / LVDS": CSI_CLK0_R_N CSI_CLK0_R_P CSI_D0_R_N CSI_D0_R_P CSI_D1_R_N CSI_D1_R_P I2C2_CSI_SCL I2C2_CSI_SDA LVDS0_CLK_R_N LVDS0_CLK_R_P
pad class NPTH: J6- J14-5 J14-7 J15-55 J15-56 J16-7 J16-8
differential pair class DIFF100: CAN CSI_CLK0 CSI_CLK0_R CSI_D0 CSI_D0_R CSI_D1 CSI_D1_R DRAM_CLK0 DRAM_CLK1 DRAM_DQS0 DRAM_DQS1 DRAM_DQS2 DRAM_DQS3 DRAM_DQS4 DRAM_DQS5 DRAM_DQS6 DRAM_DQS7 HDMI_CLK HDMI_D0 HDMI_D1 HDMI_D2 LVDS0_CLK LVDS0_CLK_R LVDS0_TX0 LVDS0_TX1 LVDS0_TX2 LVDS0_TX3 PCIE_CLK PCIE_CLK_C SATA_C_RX SATA_C_TX SATA_RX SATA_TX TRD0 TRD1 TRD2 TRD3
differential pair class DIFF90: PCIE_C_TX PCIE_RX PCIE_TX USB0 USB0_OTG USB0_OTG_L USB1 USB1_HUB USB_BOT USB_BOT_L USB_HDR USB_HDR_L USB_MCU USB_MCU_R USB_MPCIE USB_MPCIE_L USB_TOP USB_TOP_L USBDN1 USBDN2 USBDN3
net class USB1: USB1_HUB_N USB1_HUB_P USB1_N USB1_P USB_BOT_L_N USB_BOT_L_P USB_BOT_N USB_BOT_P USB_HDR_L_N USB_HDR_L_P USB_HDR_N USB_HDR_P USB_MCU_N USB_MCU_P USB_MCU_R_N USB_MCU_R_P USB_MPCIE_L_N USB_MPCIE_L_P USB_MPCIE_N USB_MPCIE_OC USB_MPCIE_P USB_TOP_L_N USB_TOP_L_P USB_TOP_N USB_TOP_P USBDN1_N USBDN1_OC USBDN1_P USBDN1_PWR_EN USBDN2_N USBDN2_OC USBDN2_P USBDN2_PWR_EN USBDN3_N USBDN3_OC USBDN3_P
net class USB0: USB0_CHD USB0_ID USB0_ID_BUFF_EN USB0_N USB0_OTG_L_N USB0_OTG_L_P USB0_OTG_N USB0_OTG_P USB0_P USB_OC
net class UART1: UART1_CTS UART1_CTS_FTDI UART1_RTS UART1_RTS_FTDI UART1_RXD UART1_RXD_FTDI UART1_TXD UART1_TXD_FTDI
net class SATA: SATA_C_RX_N SATA_C_RX_P SATA_C_TX_N SATA_C_TX_P SATA_REXT SATA_RX_N SATA_RX_P SATA_TX_N SATA_TX_P
net class DIFF100: CAN_N CAN_P CSI_CLK0_N CSI_CLK0_P CSI_CLK0_R_N CSI_CLK0_R_P CSI_D0_N CSI_D0_P CSI_D0_R_N CSI_D0_R_P CSI_D1_N CSI_D1_P CSI_D1_R_N CSI_D1_R_P DRAM_CLK0_N DRAM_CLK0_P DRAM_CLK1_N DRAM_CLK1_P DRAM_DQS0_N DRAM_DQS0_P DRAM_DQS1_N DRAM_DQS1_P DRAM_DQS2_N DRAM_DQS2_P DRAM_DQS3_N DRAM_DQS3_P DRAM_DQS4_N DRAM_DQS4_P DRAM_DQS5_N DRAM_DQS5_P DRAM_DQS6_N DRAM_DQS6_P DRAM_DQS7_N DRAM_DQS7_P HDMI_CLK_N HDMI_CLK_P HDMI_D0_N HDMI_D0_P HDMI_D1_N HDMI_D1_P HDMI_D2_N HDMI_D2_P LVDS0_CLK_N LVDS0_CLK_P LVDS0_CLK_R_N LVDS0_CLK_R_P LVDS0_TX0_N LVDS0_TX0_P LVDS0_TX1_N LVDS0_TX1_P LVDS0_TX2_N LVDS0_TX2_P LVDS0_TX3_N LVDS0_TX3_P PCIE_CLK_C_N PCIE_CLK_C_P PCIE_CLK_N PCIE_CLK_P SATA_C_RX_N SATA_C_RX_P SATA_C_TX_N SATA_C_TX_P SATA_RX_N SATA_RX_P SATA_TX_N SATA_TX_P TRD0_N TRD0_P TRD1_N TRD1_P TRD2_N TRD2_P TRD3_N TRD3_P
net class DIFF90: PCIE_C_TX_N PCIE_C_TX_P PCIE_RX_N PCIE_RX_P PCIE_TX_N PCIE_TX_P USB0_N USB0_OTG_L_N USB0_OTG_L_P USB0_OTG_N USB0_OTG_P USB0_P USB1_HUB_N USB1_HUB_P USB1_N USB1_P USB_BOT_L_N USB_BOT_L_P USB_BOT_N USB_BOT_P USB_HDR_L_N USB_HDR_L_P USB_HDR_N USB_HDR_P USB_MCU_N USB_MCU_P USB_MCU_R_N USB_MCU_R_P USB_MPCIE_L_N USB_MPCIE_L_P USB_MPCIE_N USB_MPCIE_P USB_TOP_L_N USB_TOP_L_P USB_TOP_N USB_TOP_P USBDN1_N USBDN1_P USBDN2_N USBDN2_P USBDN3_N USBDN3_P
net class GPIO: CPU_GPIO0 CPU_GPIO1 CPU_GPIO2
net class PCIE: PCIE_C_TX_N PCIE_C_TX_P PCIE_CLK_C_N PCIE_CLK_C_P PCIE_CLK_N PCIE_CLK_P PCIE_RSTN_R PCIE_RX_N PCIE_RX_P PCIE_TX_N PCIE_TX_P PCIE_WAKE PCIE_WDISN
net class FLEXCAN: CAN_N CAN_P FLEXCAN1_RX FLEXCAN1_STBY FLEXCAN1_TX FLEXCAN2_RX FLEXCAN2_TX SPLIT_R
net class BUTTONS: USER_BTN_1 USER_BTN_2 USER_BTN_3
net class MIPI_CSI: CSI_CLK0_N CSI_CLK0_P CSI_D0_N CSI_D0_P CSI_D1_N CSI_D1_P CSI_GPIO0 CSI_GPIO1 CSI_REXT
net class DRAM_A[15..0]: DRAM_A0 DRAM_A1 DRAM_A2 DRAM_A3 DRAM_A4 DRAM_A5 DRAM_A6 DRAM_A7 DRAM_A8 DRAM_A9 DRAM_A10 DRAM_A11 DRAM_A12 DRAM_A13 DRAM_A14 DRAM_A15
net class DRAM_ADDR_CTRL: DRAM_A0 DRAM_A1 DRAM_A2 DRAM_A3 DRAM_A4 DRAM_A5 DRAM_A6 DRAM_A7 DRAM_A8 DRAM_A9 DRAM_A10 DRAM_A11 DRAM_A12 DRAM_A13 DRAM_A14 DRAM_A15 DRAM_CAS_B DRAM_CS0_B DRAM_RAS_B DRAM_RESET_B DRAM_SDBA0 DRAM_SDBA1 DRAM_SDBA2 DRAM_SDCKE0 DRAM_SDODT0 DRAM_WE_B
net class DRAM_BANK0: DRAM_D0 DRAM_D1 DRAM_D2 DRAM_D3 DRAM_D4 DRAM_D5 DRAM_D6 DRAM_D7 DRAM_DQM0 DRAM_DQS0_N DRAM_DQS0_P
net class DRAM_BANK1: DRAM_D8 DRAM_D9 DRAM_D10 DRAM_D11 DRAM_D12 DRAM_D13 DRAM_D14 DRAM_D15 DRAM_DQM1 DRAM_DQS1_N DRAM_DQS1_P
net class DRAM_BANK2: DRAM_D16 DRAM_D17 DRAM_D18 DRAM_D19 DRAM_D20 DRAM_D21 DRAM_D22 DRAM_D23 DRAM_DQM2 DRAM_DQS2_N DRAM_DQS2_P
net class DRAM_BANK3: DRAM_D24 DRAM_D25 DRAM_D26 DRAM_D27 DRAM_D28 DRAM_D29 DRAM_D30 DRAM_D31 DRAM_DQM3 DRAM_DQS3_N DRAM_DQS3_P
net class DRAM_BANK4: DRAM_D32 DRAM_D33 DRAM_D34 DRAM_D35 DRAM_D36 DRAM_D37 DRAM_D38 DRAM_D39 DRAM_DQM4 DRAM_DQS4_N DRAM_DQS4_P
net class DRAM_BANK5: DRAM_D40 DRAM_D41 DRAM_D42 DRAM_D43 DRAM_D44 DRAM_D45 DRAM_D46 DRAM_D47 DRAM_DQM5 DRAM_DQS5_N DRAM_DQS5_P
net class DRAM_BANK6: DRAM_D48 DRAM_D49 DRAM_D50 DRAM_D51 DRAM_D52 DRAM_D53 DRAM_D54 DRAM_D55 DRAM_DQM6 DRAM_DQS6_N DRAM_DQS6_P
net class DRAM_BANK7: DRAM_D56 DRAM_D57 DRAM_D58 DRAM_D59 DRAM_D60 DRAM_D61 DRAM_D62 DRAM_D63 DRAM_DQM7 DRAM_DQS7_N DRAM_DQS7_P
net class DRAM_D[63..0]: DRAM_D0 DRAM_D1 DRAM_D2 DRAM_D3 DRAM_D4 DRAM_D5 DRAM_D6 DRAM_D7 DRAM_D8 DRAM_D9 DRAM_D10 DRAM_D11 DRAM_D12 DRAM_D13 DRAM_D14 DRAM_D15 DRAM_D16 DRAM_D17 DRAM_D18 DRAM_D19 DRAM_D20 DRAM_D21 DRAM_D22 DRAM_D23 DRAM_D24 DRAM_D25 DRAM_D26 DRAM_D27 DRAM_D28 DRAM_D29 DRAM_D30 DRAM_D31 DRAM_D32 DRAM_D33 DRAM_D34 DRAM_D35 DRAM_D36 DRAM_D37 DRAM_D38 DRAM_D39 DRAM_D40 DRAM_D41 DRAM_D42 DRAM_D43 DRAM_D44 DRAM_D45 DRAM_D46 DRAM_D47 DRAM_D48 DRAM_D49 DRAM_D50 DRAM_D51 DRAM_D52 DRAM_D53 DRAM_D54 DRAM_D55 DRAM_D56 DRAM_D57 DRAM_D58 DRAM_D59 DRAM_D60 DRAM_D61 DRAM_D62 DRAM_D63
net class DRAM_OTHERS: ZQPAD
net class DRAM_SDCLK: DRAM_CLK0_N DRAM_CLK0_P DRAM_CLK1_N DRAM_CLK1_P
net class ENET: ENET_LED_LINK ENET_LED_RX LED1 LED2 TRD0_N TRD0_P TRD1_N TRD1_P TRD2_N TRD2_P TRD3_N TRD3_P
net class GPIO_MISC: COMP_INT GPIO_OR_CLK GYRO_INT IR_RCV MCU_ISPN MCU_RSTINN MCU_SWDIO MCU_SWDIO_SEL TEMP_ALERT
net class HDMI: HDMI_CEC HDMI_CEC_CON HDMI_CEC_IN HDMI_CLK_N HDMI_CLK_P HDMI_D0_N HDMI_D0_P HDMI_D1_N HDMI_D1_P HDMI_D2_N HDMI_D2_P HDMI_DDC HDMI_HPD HDMI_HPD_BUFF HDMI_HPD_CON HDMI_HPD_R HDMI_SCL_CON HDMI_SCL_CON_R HDMI_SDA_CON HDMI_SDA_CON_R
net class JTAG: JTAG_MOD JTAG_NTRST JTAG_TCK JTAG_TCK_R JTAG_TDI JTAG_TDI_R JTAG_TDO JTAG_TDO_R JTAG_TMS
net class LVDS: LVDS0_CLK_N LVDS0_CLK_P LVDS0_TX0_N LVDS0_TX0_P LVDS0_TX1_N LVDS0_TX1_P LVDS0_TX2_N LVDS0_TX2_P LVDS0_TX3_N LVDS0_TX3_P
net class PWM: GPIO_OR_PWM_1 GPIO_OR_PWM_2 GPIO_OR_PWM_3 GPIO_OR_PWM_4
net class RGMII_MISC: ENET_REF_CLK ENET_REF_CLK_R ETH_ISET RGMII_INT RGMII_INT_R RGMII_MDC RGMII_MDIO RGMII_R_MDC RGMII_R_MDIO
net class RGMII_RXD: RGMII_R_RXCLK RGMII_RXCLK RGMII_RXD0 RGMII_RXD1 RGMII_RXD2 RGMII_RXD3 RGMII_RXDV
net class RGMII_TXD: RGMII_R_TXCLK RGMII_TXCLK RGMII_TXD0 RGMII_TXD1 RGMII_TXD2 RGMII_TXD3 RGMII_TXEN
net class SIM: +MPCIE_SIM_PWR +MPCIE_SIM_VPP MPCIE_SIM_C4 MPCIE_SIM_C4_R MPCIE_SIM_C8 MPCIE_SIM_C8_R MPCIE_SIM_CLK MPCIE_SIM_DATA MPCIE_SIM_RST
net class USER_LEDS: USER_LED_1 USER_LED_2 USER_LED_3 USER_LED_4 USER_LED_5 USER_LED_6 USER_LED_7 USER_LED_8
differential pair CAN: +CAN_P -CAN_N
differential pair CSI_D1_R: +CSI_D1_R_P -CSI_D1_R_N
differential pair CSI_D0_R: +CSI_D0_R_P -CSI_D0_R_N
differential pair CSI_CLK0_R: +CSI_CLK0_R_P -CSI_CLK0_R_N
differential pair USB_MCU_R: +USB_MCU_R_P -USB_MCU_R_N
differential pair USBDN3: +USBDN3_P -USBDN3_N
differential pair USB_MCU: +USB_MCU_P -USB_MCU_N
differential pair LVDS0_CLK_R: +LVDS0_CLK_R_P -LVDS0_CLK_R_N
differential pair USB0: +USB0_P -USB0_N
differential pair TRD3: +TRD3_P -TRD3_N
differential pair TRD2: +TRD2_P -TRD2_N
differential pair TRD1: +TRD1_P -TRD1_N
differential pair TRD0: +TRD0_P -TRD0_N
differential pair SATA_TX: +SATA_TX_P -SATA_TX_N
differential pair SATA_RX: +SATA_RX_P -SATA_RX_N
differential pair CSI_CLK0: +CSI_CLK0_P -CSI_CLK0_N
differential pair CSI_D0: +CSI_D0_P -CSI_D0_N
differential pair CSI_D1: +CSI_D1_P -CSI_D1_N
differential pair USB1: +USB1_P -USB1_N
differential pair USB_MPCIE: +USB_MPCIE_P -USB_MPCIE_N
differential pair PCIE_CLK: +PCIE_CLK_P -PCIE_CLK_N
differential pair PCIE_RX: +PCIE_RX_P -PCIE_RX_N
differential pair PCIE_TX: +PCIE_TX_P -PCIE_TX_N
differential pair DRAM_CLK0: +DRAM_CLK0_P -DRAM_CLK0_N
differential pair DRAM_CLK1: +DRAM_CLK1_P -DRAM_CLK1_N
differential pair DRAM_DQS0: +DRAM_DQS0_P -DRAM_DQS0_N
differential pair DRAM_DQS1: +DRAM_DQS1_P -DRAM_DQS1_N
differential pair DRAM_DQS2: +DRAM_DQS2_P -DRAM_DQS2_N
differential pair DRAM_DQS3: +DRAM_DQS3_P -DRAM_DQS3_N
differential pair DRAM_DQS4: +DRAM_DQS4_P -DRAM_DQS4_N
differential pair DRAM_DQS5: +DRAM_DQS5_P -DRAM_DQS5_N
differential pair DRAM_DQS6: +DRAM_DQS6_P -DRAM_DQS6_N
differential pair DRAM_DQS7: +DRAM_DQS7_P -DRAM_DQS7_N
differential pair HDMI_CLK: +HDMI_CLK_P -HDMI_CLK_N
differential pair HDMI_D0: +HDMI_D0_P -HDMI_D0_N
differential pair HDMI_D1: +HDMI_D1_P -HDMI_D1_N
differential pair HDMI_D2: +HDMI_D2_P -HDMI_D2_N
differential pair LVDS0_CLK: +LVDS0_CLK_P -LVDS0_CLK_N
differential pair LVDS0_TX0: +LVDS0_TX0_P -LVDS0_TX0_N
differential pair LVDS0_TX1: +LVDS0_TX1_P -LVDS0_TX1_N
differential pair LVDS0_TX2: +LVDS0_TX2_P -LVDS0_TX2_N
differential pair LVDS0_TX3: +LVDS0_TX3_P -LVDS0_TX3_N
differential pair PCIE_C_TX: +PCIE_C_TX_P -PCIE_C_TX_N
differential pair PCIE_CLK_C: +PCIE_CLK_C_P -PCIE_CLK_C_N
differential pair SATA_C_RX: +SATA_C_RX_P -SATA_C_RX_N
differential pair SATA_C_TX: +SATA_C_TX_P -SATA_C_TX_N
differential pair USBDN1: +USBDN1_P -USBDN1_N
differential pair USBDN2: +USBDN2_P -USBDN2_N
differential pair USB_HDR: +USB_HDR_P -USB_HDR_N
differential pair USB_HDR_L: +USB_HDR_L_P -USB_HDR_L_N
differential pair USB_MPCIE_L: +USB_MPCIE_L_P -USB_MPCIE_L_N
differential pair USB0_OTG_L: +USB0_OTG_L_P -USB0_OTG_L_N
differential pair USB0_OTG: +USB0_OTG_P -USB0_OTG_N
differential pair USB1_HUB: +USB1_HUB_P -USB1_HUB_N
differential pair USB_BOT_L: +USB_BOT_L_P -USB_BOT_L_N
differential pair USB_BOT: +USB_BOT_P -USB_BOT_N
differential pair USB_TOP_L: +USB_TOP_L_P -USB_TOP_L_N
differential pair USB_TOP: +USB_TOP_P -USB_TOP_N

## Components (designator, comment, footprint, x,y, rotation, side; value= is the part's Value field where it differs from the comment)
C1 "220n" C0201 44.2,24.9 r0 top
C2 "220n" C0201 46,24.9 r180 top
C3 "220n" C0201 53.2,36.1 r180 top
C4 "220n" C0201 47.8,24.9 r0 top
C5 "220n" C0201 47.8,36.9 r180 top
C6 "220n" C0201 53.2,48.1 r180 top
C7 "100n" C0201 39.2,40.3 r0 bottom
C8 "220n" C0201 47.8,48.9 r180 top
C9 "220n" C0201 53.2,60.1 r180 top
C10 "220n" C0201 47.8,60.9 r180 top
C11 "220n" C0201 53.2,72.1 r180 top
C12 "220n" C0201 49.3,24.9 r180 top
C13 "100n" C0201 58.6,34 r0 top
C14 "100n" C0201 60.4,30.8 r270 top
C15 "100n" C0201 58.7,29.2 r270 top
C16 "100n" C0201 61.5,27 r270 top
C17 "100n" C0201 58.8,27.2 r270 top
C18 "100n" C0201 61.1,24.2 r270 top
C19 "10u" C0603 59.3,52.5 r90 top
C20 "22u" C0603 63,26.9 r90 top
C21 "220n" C0201 52.9,24.9 r180 top
C22 "220n" C0201 54.7,24.9 r180 top
C23 "220n" C0201 44.2,36.1 r180 top
C24 "220n" C0201 46,36.1 r180 top
C25 "220n" C0201 47.8,36.1 r180 top
C26 "220n" C0201 55,36.1 r0 top
C27 "22u" C0603 42.3,26.5 r270 top
C28 "22u" C0603 42.6,39.4 r90 top
C29 "22u" C0603 59.2,45.3 r270 top
C30 "220n" C0201 56.8,36.1 r0 top
C31 "22u" C0603 42.6,63.3 r90 top
C32 "22u" C0603 59.3,57.1 r270 top
C33 "22u" C0603 42.6,49 r270 top
C34 "220n" C0201 44.2,36.9 r0 top
C35 "220n" C0201 46,36.9 r180 top
C36 "220n" C0201 51.4,36.9 r180 top
C37 "220n" C0201 53.2,36.9 r180 top
C38 "220n" C0201 55,36.9 r180 top
C39 "220n" C0201 44.2,48.1 r180 top
C40 "220n" C0201 46,48.1 r180 top
C41 "220n" C0201 47.8,48.1 r180 top
C42 "220n" C0201 55,48.1 r0 top
C43 "220n" C0201 56.8,48.1 r0 top
C44 "220n" C0201 44.2,48.9 r0 top
C45 "220n" C0201 46,48.9 r180 top
C46 "220n" C0201 51.4,48.9 r180 top
C47 "220n" C0201 53.2,48.9 r180 top
C48 "220n" C0201 55,48.9 r180 top
C49 "220n" C0201 44.2,60.1 r180 top
C50 "220n" C0201 46,60.1 r180 top
C51 "220n" C0201 47.8,60.1 r180 top
C52 "220n" C0201 55,60.1 r0 top
C53 "220n" C0201 56.8,60.1 r0 top
C54 "220n" C0201 44.2,60.9 r0 top
C55 "220n" C0201 46,60.9 r180 top
C56 "220n" C0201 51.4,60.9 r180 top
C57 "220n" C0201 53.2,60.9 r180 top
C58 "220n" C0201 55,60.9 r180 top
C59 "220n" C0201 44.2,72.1 r180 top
C60 "220n" C0201 46,72.1 r180 top
C61 "220n" C0201 25.3,44.1 r90 bottom
C62 "220n" C0201 24.3,44.1 r90 bottom
C63 "100n" C0402 18.2,39.1 r180 top
C64 "220n" C0201 24,43.1 r180 bottom
C65 "100n" C0402 18.2,40.2 r180 top
C66 "100n" C0402 17.7,37.4 r270 top
C67 "100n" C0402 18.7,37.4 r270 top
C68 "220n" C0201 23.7,44.1 r270 bottom
C69 "10n" C0402 17.6,49.1 r180 top
C70 "10n" C0402 17.6,50.1 r180 top
C71 "10n" C0402 17.6,47.9 r180 top
C72 "10n" C0402 17.6,46.9 r180 top
C73 "220n" C0201 24,45.4 r0 bottom
C74 "100n" C0201 58.8,23.5 r180 top
C75 "220n" C0201 24,46 r0 bottom
C76 "220n" C0201 28.5,44.1 r90 bottom
C77 "220n" C0201 29.1,44.1 r90 bottom
C78 "4u7" C0402 21.8,37.3 r180 bottom
C79 "220n" C0201 35.2,43.8 r0 bottom
C80 "10u" C0603 20.1,46.5 r180 bottom
C81 "220n" C0201 23.9,48.1 r90 bottom
C82 "220n" C0201 25.6,47.6 r0 bottom
C83 "18p" C0402 17.4,45.2 r90 top
C84 "18p" C0402 17.4,43.2 r270 top
C85 "100n" C0201 55.5,22.9 r0 top
C86 "100n" C0201 54.2,22.9 r180 top
C87 "100n" C0402 3.6,38.8 r90 bottom
C88 "100u / 10V" C2312 26.6,9.5 r0 top
C89 "100n" C0402 12.2,37.2 r0 bottom
C90 "220n" C0201 25.9,50.3 r90 bottom
C91 "220n" C0201 26.9,50.3 r90 bottom
C92 "220n" C0201 27.5,50.3 r90 bottom
C93 "220n" C0201 28.5,50.3 r90 bottom
C94 "220n" C0201 29.1,50.3 r90 bottom
C95 "220n" C0201 31.7,50.3 r90 bottom
C96 "22u" C0603_small 25.6,48.9 r180 bottom
C97 "220n" C0201 26.9,47.5 r270 bottom
C98 "220n" C0201 27.5,47.5 r270 bottom
C99 "220n" C0201 28.8,47.6 r180 bottom
C100 "220n" C0201 31.6,47.4 r270 bottom
C101 "22u" C0603_small 28.2,48.9 r0 bottom
C102 "220n" C0201 26.9,46.3 r270 bottom
C103 "220n" C0201 27.5,46.3 r270 bottom
C104 "220n" C0201 28.8,46.2 r180 bottom
C105 "220n" C0201 31.6,46.2 r270 bottom
C106 "22u" C0603_small 30.4,47.1 r90 bottom
C107 "220n" C0201 28.5,45.3 r90 bottom
C108 "220n" C0201 29.1,45.3 r90 bottom
C109 "220n" C0201 31.7,44.9 r270 bottom
C110 "220n" C0201 32.3,44.9 r270 bottom
C111 "22u" C0603_small 30.4,44.5 r270 bottom
C112 "220n" C0201 32.4,46.2 r90 bottom
C113 "220n" C0201 33.3,46.2 r90 bottom
C114 "220n" C0201 32.4,47.4 r270 bottom
C115 "220n" C0201 33.3,47.4 r270 bottom
C116 "220n" C0201 32.3,50.3 r90 bottom
C117 "220n" C0201 33.3,50.3 r90 bottom
C118 "22u" C0603_small 32.5,48.9 r180 bottom
C119 "220n" C0201 25.9,51.5 r270 bottom
C120 "220n" C0201 26.9,51.5 r270 bottom
C121 "220n" C0201 27.5,51.5 r270 bottom
C122 "220n" C0201 28.5,51.5 r270 bottom
C123 "220n" C0201 29.1,51.5 r270 bottom
C124 "220n" C0201 31.7,51.5 r90 bottom
C125 "220n" C0201 32.3,51.5 r90 bottom
C126 "220n" C0201 33.3,51.5 r90 bottom
C127 "22u" C0603_small 30.4,49.7 r270 bottom
C128 "22u" C0603_small 23.4,52.9 r180 bottom
C129 "22u" C0603_small 25.6,56.7 r90 bottom
C130 "220n" C0201 25.9,52.9 r90 bottom
C131 "220n" C0201 26.9,52.7 r90 bottom
C132 "220n" C0201 27.5,52.7 r90 bottom
C133 "220n" C0201 28.5,52.7 r90 bottom
C134 "220n" C0201 29.1,52.7 r90 bottom
C135 "22u" C0603_small 30.4,52.3 r90 bottom
C136 "220n" C0201 25.9,44.1 r270 bottom
C137 "22u" C0603 20.1,48.1 r180 bottom
C138 "220n" C0201 28.8,47 r180 bottom
C139 "10n" C0201 25.9,46.5 r90 bottom
C140 "220n" C0201 27.2,45.4 r0 bottom
C141 "22u" C0603 24,39.4 r270 bottom
C142 "220n" C0201 25.3,46.5 r270 bottom
C143 "220n" C0201 25.6,45.4 r180 bottom
C144 "220n" C0201 30.5,54.1 r0 bottom
C145 "220n" C0201 30.4,42.8 r0 bottom
C146 "220n" C0201 28.8,53.7 r180 bottom
C147 "22u" C0603 30.4,55.9 r90 bottom
C148 "22u" C0603 22,51.3 r180 bottom
C149 "220n" C0201 27.5,44.1 r90 bottom
C150 "220n" C0201 22.7,44.1 r270 bottom
C151 "22u" C0603 20.9,42.5 r180 bottom
C152 "220n" C0201 25.3,52.9 r90 bottom
C153 "220n" C0402 16.6,57.2 r180 bottom
C154 "220n" C0201 25.3,51.5 r270 bottom
C155 "220n" C0201 32,53.7 r0 bottom
C156 "22u" C0603 32.9,56.1 r0 bottom
C157 "220n" C0201 35.2,44.4 r0 bottom
C158 "220n" C0201 34.4,46 r0 bottom
C159 "220n" C0201 34.4,47 r0 bottom
C160 "220n" C0201 34.4,47.6 r0 bottom
C161 "220n" C0201 34.5,50.5 r90 bottom
C162 "220n" C0201 33.9,50.3 r90 bottom
C163 "220n" C0201 32,43.8 r0 bottom
C164 "220n" C0201 23.865,49.7 r270 bottom
C165 "220n" C0201 25.3,50.3 r90 bottom
C166 "220n" C0201 27.2,53.7 r180 bottom
C167 "220n" C0201 34.9,52.9 r90 bottom
C168 "220n" C0201 33.6,52.4 r0 bottom
C169 "220n" C0201 33.9,51.5 r90 bottom
C170 "220n" C0201 31.7,52.7 r270 bottom
C171 "220n" C0201 32.3,52.7 r270 bottom
C172 "22u" C0603_small 35.1,48.9 r0 bottom
C173 "22u" C0603_small 33.6,54.1 r90 bottom
C174 "220n" C0201 26.9,44.1 r90 bottom
C175 "22pF" C0402 20.8,71.1 r90 top
C176 "22pF" C0402 20.8,68.9 r270 top
C177 "22pF" C0402 9.2,10.7 r270 bottom
C178 "22pF" C0402 6.7,10.1 r270 bottom
C179 "22pF" C0402 6.7,14.3 r90 bottom
C180 "10u" C0603 13.1,65.5 r0 bottom
C181 "100n" C0402 10.4,69.6 r180 bottom
C182 "10n" C0402 12.7,68.8 r0 bottom
C183 "10n" C0402 12.7,66.8 r0 bottom
C184 "10n" C0402 12.5,64.1 r0 bottom
C185 "10n" C0402 14.5,64.1 r0 bottom
C186 "10u" C0603 15.3,72 r180 bottom
C187 "100n" C0402 15.5,70 r270 bottom
C188 "10n" C0402 14.5,70 r270 bottom
C189 "10n" C0402 16.5,70 r270 bottom
C190 "100n" C0402 12.3,70.5 r270 bottom
C191 "10u" C0603 21.8,69.6 r0 bottom
C192 "100n" C0402 20.3,67.8 r270 bottom
C193 "10n" C0402 18.6,67.2 r180 bottom
C194 "10u" C0603 14.9,60.4 r270 bottom
C195 "100n" C0402 10.4,68.4 r180 bottom
C196 "10n" C0402 18.6,66.1 r180 bottom
C197 "10n" C0402 17.1,64.1 r90 bottom
C198 "10n" C0402 12.7,67.8 r0 bottom
C199 "10u" C0603 21.8,71.1 r0 bottom
C200 "10n" C0402 13.4,70.5 r270 bottom
C201 "10n" C0402 18.6,68.3 r180 bottom
C202 "10n" C0402 17.7,70 r270 bottom
C203 "220n" C0201 47.8,72.1 r180 top
C204 "220n" C0201 55,72.1 r0 top
C205 "220n" C0201 56.8,72.1 r0 top
C206 "100n" C0201 50.9,23.3 r90 top
C207 "100n" C0402 25.8,37.2 r180 top
C208 "4u7" C0402 33.5,44.4 r90 bottom
C209 "4u7" C0402 18.4,51.8 r270 bottom
C210 "22pF" C0402 9.2,12.7 r270 bottom
C211 "18p" C0201 20.3,44.3 r270 bottom
C212 "18p" C0201 20.8,45.2 r0 bottom
C213 "100n" C0402 29.3,76.9 r90 top
C214 "100n" C0402 29.3,79.1 r270 top
C215 "100n" C0402 28.9,83 r180 top
C216 "100n" C0402 40.4,87.7 r180 bottom
C217 "100n" C0402 41,83 r0 top
C218 "100n" C0402 54.4,26 r0 bottom
C219 "100n" C0402 21.8,19.1 r180 top
C220 "10n" C0402 21.8,18.1 r180 top
C221 "100n" C0402 15.9,23.5 r270 top
C222 "10n" C0402 16.9,23.5 r270 top
C223 "18p" C0402 23.5,20.5 r270 bottom
C224 "18p" C0402 23.4,18.2 r90 bottom
C225 "10u" C0603 6.8,59.6 r0 bottom
C226 "100n" C0402 6.7,60.9 r0 bottom
C227 "10u" C0603 31.7,13.7 r270 top
C228 "100n" C0402 33,13.2 r270 top
C229 "100n" C0201 58.2,32.7 r270 top
C230 "100n" C0402 11,3.3 r180 bottom
C231 "10u" C0603 24.2,6.9 r0 top
C232 "100n" C0402 21.5,7.2 r180 top
C233 "100u / 10V" C2312 46.7,90.5 r90 bottom
C234 "100u / 10V" C2312 46.7,90.5 r90 top
C235 "100n" C0402 52.7,87.6 r180 bottom
C236 "100n" C0402 57.7,75.8 r0 bottom
C237 "1u" C0402 66.1,82.9 r90 top
C238 "100u / 10V" C2312 7.4,72.1 r90 bottom
C239 "10u" C0603 12.9,79.5 r90 bottom
C240 "10u" C0603 18.8,80.7 r90 bottom
C241 "560pF" C0402 18.4,78.6 r180 bottom
C242 "18p" C0402 64.3,76.5 r0 bottom
C243 "100n" C0402 64.6,70.6 r90 bottom
C244 "4u7" C0402 28.1,38 r0 bottom
C245 "4u7" C0402 63.4,70.6 r270 bottom
C246 "4u7" C0402 29.1,39.1 r180 bottom
C247 "4u7" C0402 31,37.4 r0 bottom
C248 "10n" C0402 16.1,64.1 r90 bottom
C249 "10n" C0402 18.6,65 r180 bottom
C250 "100n" C0402 68,70.8 r0 bottom
C251 "4u7" C0402 68,72 r180 bottom
C252 "100n" C0402 44.1,82.9 r0 bottom
C253 "1u" C0402 59.8,78.1 r180 bottom
C254 "1u" C0402 63.7,68.7 r0 top
C255 "100n" C0402 58.7,74.6 r0 bottom
C256 "100n" C0402 62.2,70.6 r90 bottom
C257 "330u" C2917 53.4,19.7 r180 top locked
C258 "330u" C2917 42,19.7 r180 top locked
C259 "100n" C0402 56.6,26.2 r90 bottom
C260 "100n" C0402 44.9,26 r180 bottom
C261 "100n" C0402 38,26.2 r90 bottom
C262 "4u7" C0402 31.6,20.7 r180 bottom
C263 "4u7" C0402 41.1,13.375 r0 bottom
C264 "4u7" C0402 54.5,15.9 r180 top
C265 "100n" C0402 36.6,26.2 r90 bottom
C266 "100n" C0402 39.1,13.375 r180 bottom
C267 "100n" C0402 45.5,23.1 r180 top
C268 "100n" C0402 59.2,21.5 r0 top
C269 "100n" C0402 65.7,77.8 r0 bottom
C270 "100n" C0402 60.4,76.3 r270 bottom
C271 "1u" C0402 59.4,76.3 r90 bottom
C272 "100n" C0402 22.2,72.7 r0 bottom
C273 "100n" C0402 25.4,91.4 r90 bottom
C274 "100n" C0402 22.8,76.6 r90 bottom
C275 "100n" C0402 9.2,79 r270 bottom
C276 "100n" C0402 10.1,72.2 r90 bottom
C277 "100n" C0201 59.4,30.1 r270 top
C278 "10u" C0603 31.9,8.5 r270 bottom
C279 "100n" C0402 33.3,7.7 r270 bottom
C280 "10u" C0603 52.6,9.2 r0 top
C281 "100n" C0402 48.8,11 r90 top
C282 "100n" C0402 51.2,14.8 r0 bottom
C283 "100n" C0402 52.1,10.7 r180 top
C284 "100n" C0402 63.5,7.5 r90 bottom
C285 "100n" C0402 56.4,4.2 r270 bottom
C286 "270pF" C0402 62.5,9.1 r90 bottom
C287 "270pF" C0402 59.4,2 r270 bottom
C288 "100pF" C0402 61.9,6.3 r180 bottom
C289 "100pF" C0402 57.4,4.2 r270 bottom
C290 "220u, 4V" "C1206 -  TLN S CASE TANTAL" 55.6,6.4 r0 bottom
C291 "220u, 4V" "C1206 -  TLN S CASE TANTAL" 59.8,7.7 r270 bottom
C292 "100n" C0402 49.8,8.7 r180 top
C293 "1u" C0402 52.8,7.2 r270 bottom
C294 "100n" C0402 55.2,8.6 r90 bottom
C295 "270pF" C0402 57.5,10.6 r0 bottom
C296 "100n" C0402 40.5,8.4 r180 bottom
C297 "100n" C0201 58.4,28.2 r180 top
C298 "100n" C0402 11.6,49.9 r90 bottom
C299 "10u" C0603 63.1,46.2 r90 bottom
C300 "100n" C0402 63.3,43.6 r270 bottom
C301 "100n" C0402 65.5,66.4 r180 bottom
C302 "100n" C0402 68,66.3 r0 bottom
C303 "100n" C0402 63.3,66 r90 bottom
C304 "10uF / 16V" C0805 66.8,67.7 r180 top
C305 "100n" C0201 60.8,27 r90 top
C306 "100n" C0201 58.1,27.2 r90 top
C307 "100n" C0402 2.9,67 r270 top
C308 "100n" C0201 60.8,23.2 r180 top
C309 "100n" C0402 4,55.7 r180 bottom
C310 "100n" C0402 12.3,50.7 r0 top
C311 "100pF" C0402 3.8,45.5 r180 bottom
C312 "100pF" C0402 5.8,45.5 r0 bottom
C313 "10n" C0402 7.4,46.3 r270 bottom
C314 "100n" C0402 12.1,58.9 r90 bottom
C315 "100n" C0402 13.8,52.4 r90 top
C316 "100n" C0402 15.4,51.9 r180 top
C317 "100n" C0201 57.7,24.5 r180 top
C318 "100n" C0201 54.6,23.9 r90 top
C319 "100n" C0201 50.6,24.9 r180 top
C320 "100n" C0201 53.9,23.9 r90 top
C321 "22u" C0603 62.2,30.1 r90 top
C322 "100n" C0201 50.2,24.3 r180 top
C323 "100n" C0201 42.1,46.7 r270 top
C324 "100n" C0402 59.8,34 r0 bottom
C325 "100n" C0402 66.7,13 r90 bottom
C326 "1u" C0402 26.8,85.4 r180 top
C327 "2p2" C0201 41,50.5 r270 top
C328 "2p2" C0201 41.3,49.3 r0 top
C329 "100n" C0402 65.3,8.4 r180 top
C330 "1u" C0402 23.5,29 r0 bottom
C331 "2u2" C0402 23.4,30.2 r0 bottom
C332 "1u" C0402 24.2,23.3 r0 bottom
C333 "4u7" C0402 24,27.8 r0 bottom
C334 "2u2" C0402 25.6,24.6 r0 bottom
C335 "1u" C0402 29.5,24.1 r90 bottom
C336 "4u7" C0402 24.6,22.3 r0 bottom
C337 "2u2" C0402 28.1,21.8 r270 bottom
C338 "2u2" C0402 29.6,20.7 r180 bottom
C339 "1u" C0402 24,18.9 r180 top
C340 "100n" C0402 24,21.1 r180 top
C341 "100n" C0402 29.6,21.9 r180 bottom
C342 "100n" C0402 22.2,20.6 r270 top
C343 "470nF" C0402 31.6,21.8 r180 bottom
C344 "4u7" C0402 27.4,30 r0 bottom
C345 "100n" C0402 26.8,28.3 r270 bottom
C346 "100n" C0402 27.8,28.3 r270 bottom
C347 "4u7" C0402 28.8,28.3 r270 bottom
C348 "4u7" C0402 26.6,22.3 r180 bottom
C349 "100n" C0402 28.5,24.1 r90 bottom
C350 "100n" C0402 27.5,24.1 r90 bottom
C351 "4u7" C0402 27.6,25.9 r0 bottom
C352 "22u" C0603 32.9,33.4 r270 top
C353 "22u" C0603 30.4,35.1 r0 top
C354 "22u" C0603 31.3,32.8 r270 top
C355 "22u" C0603 29.7,32.8 r270 top
C356 "22u" C0603 32.2,19.7 r90 top
C357 "22u" C0603 30.6,19.7 r90 top
C358 "22u" C0603 32.2,16.7 r270 top
C359 "22u" C0603 30.6,16.7 r270 top
C360 "22u" C0603 21.6,33.3 r180 top
C361 "22u" C0603 21.6,34.7 r180 top
C362 "22u" C0603 18.6,29.4 r180 top
C363 "22u" C0603 18.6,30.8 r180 top
C364 "22u" C0603 18.1,23.3 r270 top
C365 "22u" C0603 19.5,23.3 r270 top
C366 "22u / 10V" C0603 34.4,29.6 r180 top
C367 "10uF / 16V" C0805 39.9,23.6 r0 top
C368 "100n" C0402 37.6,24.2 r90 top
C369 "4u7" C0402 25.4,30 r180 bottom
C370 "100n" C0402 25.7,28.3 r270 bottom
C371 "100n" C0402 25.6,25.7 r0 bottom
C372 "4u7" C0402 23.4,24.9 r180 bottom
C373 "4u7" C0402 23.4,26 r180 bottom
C374 "100n" C0402 25.6,26.8 r0 bottom
C375 "1u" C0402 29.7,25.9 r180 bottom
C376 "10uF / 16V" C0805 34.1,26.1 r0 bottom
C377 "1u" C0402 31.2,27 r180 bottom
C378 "220n" C0402 30.3,28.2 r180 bottom
C379 "1u" C0402 31.6,25.5 r270 bottom
C380 "100n" C0402 30.3,29.4 r180 bottom
C381 "22u" C0603 30.3,16.7 r270 bottom
C382 "100n" C0402 2.7,31.4 r90 bottom
C383 "100n" C0402 50.7,28.4 r270 bottom
C384 "100n" C0402 29.4,69.8 r90 top
C385 "100n" C0402 21,21.8 r90 top
C386 "100n" C0402 12.2,37.2 r180 top
C387 "4u7" C0402 63.6,18.2 r270 bottom
C388 "100n" C0402 58.9,14.6 r180 top
C389 "100n" C0402 62.5,14 r270 top
C390 "220n" C0402 63.6,17.1 r90 top
C391 "4u7" C0402 60.9,14.5 r180 top
C392 "100n" C0402 58.2,49.9 r270 top
C393 "100n" C0402 58.2,47.7 r270 top
C394 "1u" C0402 65.7,13 r90 bottom
C395 "100n" C0402 13.3,24 r180 bottom
C396 "10n" C0402 26.8,86.4 r0 top
C397 "4u7" C0402 1.8,55.7 r180 bottom
C398 "100n" C0402 63.6,15.1 r270 top
C399 "100n" C0402 61.6,19.5 r0 top
C400 "1u" C0402 39.4,30.5 r90 bottom
C401 "100n" C0402 40.6,30.5 r90 bottom
C402 "100n" C0402 42.1,30.4 r0 bottom
C403 "100n" C0402 40,28.8 r180 top
C404 "10n" C0402 36.5,31 r90 top
C405 "100n" C0402 62.4,23.9 r180 bottom
C406 "22u" C0603 14,31.6 r180 top
C407 "22u" C0603 16.3,31.9 r90 top
C408 "22u" C0603 24.5,32.9 r0 bottom
C409 "22u" C0603 24.5,34.5 r0 bottom
C410 "22pF" C0402 14.6,35.4 r0 top
C411 "220pF" C0402 14.4,35.7 r180 bottom
C412 "100n" C0402 5.7,42.6 r270 bottom
C413 "100n" C0402 1.3,40.8 r270 bottom
C414 "100n" C0402 37.6,81.1 r180 bottom
C415 "18p" C0402 61.4,75 r270 bottom
C416 "100n" C0402 64.9,86.3 r90 top
C417 "100n" C0402 28.2,69.8 r270 top
C418 "100n" C0402 27,69.8 r270 top
C419 "10u" C0603 14,55 r0 bottom
C420 "100n" C0402 10.1,66.9 r90 bottom
C421 "10uF / 16V" C0805 58.9,85 r270 bottom
C422 "100n" C0402 64.8,82.3 r90 bottom
C423 "100n" C0402 12.3,43.6 r180 top
C424 "22u" C0603 21.6,31.9 r180 top
C425 "22u" C0603 18.5,32.4 r180 top
C426 "22u" C0603 19.5,26.7 r90 top
C427 "22u" C0603 15,86.8 r270 bottom
C428 "22u" C0603 16.6,86.8 r270 bottom
C429 "22u" C0603 21.4,87 r270 bottom
C430 "22u" C0603 19.8,87 r270 bottom
C431 "22u" C0603 18.2,87 r270 bottom
C432 "22pF" C0402 14,93.3 r90 bottom
C433 "220pF" C0402 11.6,93.3 r270 bottom
C434 "22u / 10V" C0603 34.4,31.1 r180 top
C435 "100n" C0402 31.2,24 r180 bottom
C436 "2u2" C0402 31.2,23 r180 bottom
C437 "1u" C0402 24,20 r180 top
CR1 "Mini PCIe Card" "MINI_PCIE_FULL CARD" 32,19.5 r90 bottom
CR2 "Micro SD Card" MICRO_SD_CARD 42.9,13.25 r0 top
CR3 "Micro SIM Card" MICRO_SIM_CARD 44.5,30.8 r0 bottom
D1 "Red" LED_0603 2.1,84.2 r180 top
D2 "Red" LED_0603 2.1,82 r180 top
D3 "Red" LED_0603 2.1,79.8 r180 top
D4 "PGB1010603MR" C0603 66,79.9 r270 bottom
D5 "Red" LED_0603 2.1,75.4 r180 top
D6 "Red" LED_0603 2.1,73.2 r180 top
D7 "Red" LED_0603 2.1,71 r180 top
D8 "PGB1010603MR" C0603 66,75.5 r270 bottom
D9 "S8MC-13" SMC 23.7,14.4 r180 top locked
D10 "RB751V-40-TP" SOD323 24.8,67.5 r180 top
D11 "Green" LED_0603 32.2,11.3 r0 top
D12 "Orange" LED_0603 68.8,70.5 r270 top
D13 "BAT54HT1G" SOD323 40.8,74.1 r270 top
D14 "Orange" LED_0603 51,1.9 r270 top
D15 "BZA956A,115" SOT665 51.3,26.5 r180 bottom
D16 "BGX50AE6327" SOT143 25.9,8.9 r0 bottom
D17 "BGX50AE6327" SOT143 54.1,85.2 r270 bottom
D18 "MBR140SFT1G" SOD-123FL 35.1,27.7 r180 top
D19 "PGB1010603MR" C0603 27,6.9 r0 top
D20 "BGX50AE6327" SOT143 54.5,76.8 r90 bottom
D21 "Orange" LED_0603 31.6,1.9 r270 top
D22 "Green" LED_0603 3.8,8.3 r180 top
D23 "BGX50AE6327" SOT143 9.1,67.6 r180 top
D24 "Orange" LED_0603 18.5,1.9 r270 top
D25 "Green" LED_0603 32.2,9.4 r0 top
D26 "Green" LED_0603 32.2,7.5 r0 top
D27 "RB751V-40-TP" SOD323 9.3,2.6 r90 bottom
D28 "RB751V-40-TP" SOD323 29.7,32.1 r270 bottom
D29 "RB751V-40-TP" SOD323 6.3,24.7 r180 bottom
D30 "MBR140SFT1G" SOD-123FL 56.3,88 r180 bottom
D31 "PGB1010603MR" C0603 66,72.4 r270 bottom
D32 "PGB1010603MR" C0603 65.4,86.7 r180 bottom
D33 "Red" LED_0603 2.1,77.6 r180 top
D34 "Red" LED_0603 2.1,68.8 r180 top
D35 "RB751V-40-TP" SOD323 19.2,59.9 r0 bottom
D36 "RB751V-40-TP" SOD323 23.9,15.2 r0 bottom
D37 "BZA956A,115" SOT665 7.4,12.2 r0 bottom
D38 "MBR140SFT1G" SOD-123FL 59.2,88 r0 bottom
D39 "RB751V-40-TP" SOD323 1.5,24.5 r270 bottom
FB1 "220R, 2.5A" C0603 22.4,39.4 r90 bottom
FB2 "220R, 2.5A" C0603 22.8,9.9 r0 bottom
FB3 "BLM18KG101TN1D" C0603 12,62 r90 bottom
FB4 "BLM18KG101TN1D" C0603 18.1,72 r180 bottom
FB5 "BLM15AX601SN1D" C0402 22.2,67.8 r90 bottom
FB6 "BLM18KG101TN1D" C0603 13.4,60.4 r90 bottom
FB7 "BLM18KG101TN1D" C0603 24.8,71.9 r180 bottom
FB8 "BLM15AX300SN1D 30R / 1.1A" C0402 21.7,63.7 r180 bottom
FB9 "220R, 2.5A" C0603 54.5,14.6 r0 top
FB10 "220R, 2.5A" C0603 31,19 r180 bottom
FB11 "MPZ1608S601A 600OHM/1A" C0603 52,13.2 r0 top
FB12 "MPZ1608S601A 600OHM/1A" C0603 50.2,10.6 r90 top
FB13 "MPZ1608S601A 600OHM/1A" C0603 50.4,16.1 r180 top
FB14 "220R, 2.5A" C0603 30.4,8.5 r90 bottom
FB15 "120R, 1.3A" C0402 9.7,9.2 r0 bottom
FB16 "220R, 2.5A" C0603 6.8,58 r180 bottom
FB17 "220R, 2.5A" C0603 34.4,17.9 r0 top
FB18 "BLM15AX601SN1D" C0402 56.4,8.6 r90 bottom
FB19 "MPZ1608S601A 600OHM/1A" C0603 60.4,67.3 r90 top
FB20 "MPZ1608S601A 600OHM/1A" C0603 50.5,13.2 r0 top
FB21 "BLM15AX601SN1D" C0402 61.4,9.1 r90 bottom
FB22 "BLM15AX601SN1D" C0402 58.9,3.5 r0 bottom
FB23 "MPZ1608S601A 600OHM/1A" C0603 43.2,81.4 r180 bottom
FB24 "MPZ1608S601A 600OHM/1A" C0603 46.2,81.4 r0 bottom
FB25 "120R, 1.3A" C0402 7.7,10.1 r90 bottom
FB26 "MPZ1608S601A 600OHM/1A" C0603 51.9,16.1 r0 top
FB27 "120R, 1.3A" C0402 7.7,14.3 r270 bottom
FB28 "120R, 1.3A" C0402 11.6,15.3 r270 bottom
FB29 "BLM15AX601SN1D" C0402 25.4,16.4 r180 bottom
FB30 "BLM15AX601SN1D" C0402 23.4,16.4 r0 bottom
FB31 "220R, 2.5A" C0603 67.6,67.8 r0 bottom
FB32 "220R, 2.5A" C0603 66.1,67.8 r180 bottom
FB33 "MPZ1608S601A 600OHM/1A" C0603 62.4,19.9 r270 bottom
FB34 "220R, 2.5A" C0603 7,64.8 r270 bottom
FB35 "220R, 2.5A" C0603 7,66.3 r90 bottom
FB36 "MPZ1608S601A 600OHM/1A" C0603 38.1,27.9 r0 bottom
FB37 "220R, 2.5A" C0603 35.9,17.9 r180 top
FB38 "MPZ1608S601A 600OHM/1A" C0603 41.7,81.4 r0 bottom
FB39 "220R, 2.5A" C0603 61.5,46.2 r90 bottom
FB40 "220R, 2.5A" C0603 12.5,56.9 r180 bottom
FB41 "220R, 2.5A" C0603 61.5,44.7 r270 bottom
FB42 "220R, 2.5A" C0603 14,56.9 r0 bottom
FB43 "BLM15AX601SN1D" C0402 7.7,50.9 r270 bottom
FB44 "BLM15AX601SN1D" C0402 7.7,49.9 r90 bottom
FID1 "FID_1MM_SMALL" FID_40X52D#1 10,1 r0 top
FID2 "FID_1MM_SMALL" FID_40X52D#2 60,7 r90 top
FID3 "FID_1MM_SMALL" FID_40X52D#2 61,92 r90 top
FID4 "FID_1MM_SMALL" FID_40X52D#2 12,92 r90 top
FID5 "FID_1MM_SMALL" FID_40X52D#3 5.5,7.5 r90 bottom
FID6 "FID_1MM_SMALL" FID_40X52D#2 62,1.5 r90 bottom
FID7 "FID_1MM_SMALL" FID_40X52D#2 7.5,94 r90 bottom
FID8 "FID_1MM_SMALL" FID_40X52D#2 61,93.5 r90 bottom
J1 "ESQ-120-14-G-S" ESQ-120-14-G-S 9.62,64.1 r0 top locked
J2 "ESQ-120-14-G-D" ESQ-120-14-G-D 65.5,64.1 r180 bottom locked
J3 "HDR 1x6, 2.54mm" HDR_1X6_2.54MM 68.04,86.3 r0 top
J4 "5787617-1" USB-2A 56,82.1 r0 top locked
J5 "47151-0001" "HDMI V1.1" 36.5,88.8 r90 top locked
J6 "L829-1J1T-43" L829-1J1T-43 16.2,84.8 r0 top locked
J7 "4-1734592-0" 4-1734592-0 4,72.1 r90 bottom locked
J8 "0471554001" SATA_VERTICAL 3.2,25.7 r270 top locked
J9 "PJ-002AH" POWER_JACK_5.5_2.1MM_NS_V1.1 12.4,12.1 r180 top locked
J10 "0532610471" 0532610471 3.7,13 r180 bottom locked
J11 "USB MICRO AB" USB_MICRO_AB 24.9,2.2 r90 top locked
J12 "1-84952-5" ZIF_RA_BOTTOM_15X1MM 41.6,5.2 r180 bottom locked
J13 "693071010811" 693071010811 41,9 r180 top locked
J14 "FC68125" FC68125 57.9,12.6 r90 top locked
J15 "MM60-52B1-E1-R650" MINI_PCIE_52PIN_CARD_CON 59.5,19.5 r90 bottom locked
J16 "MM60-EZH059-B5-R650" MINI_PCIE_52PIN_CARD_LATCH 59.1,69.8 r90 bottom locked
J17 "693022010811" SIM_MICRO_HINGED 51,36.1 r180 bottom locked
JP1 "HDR 1x2" HDR_1X2_2.54MM 2.5,19.8 r90 top
JP2 "HDR 1x2" HDR_1X2_2.54MM 1.9,86.3 r90 top locked
L1 "1u / 3.9A" IHLP_118MILX144MIL 27.3,33.3 r90 top
L2 "1u / 3.9A" IHLP_118MILX144MIL 27.6,19.5 r0 top
L3 "ACM2012-900-2P-T002" ACM2012 50.4,88.9 r90 bottom
L4 "ACM2012-900-2P-T002" ACM2012 22.8,11.6 r180 bottom
L5 "ACM2012-900-2P-T002" ACM2012 51.3,76.8 r180 bottom
L6 "ACM2012-900-2P-T002" ACM2012 41.5,26.4 r90 bottom